# Altium PCB cm4gateway.PcbDoc (part 1 of 5)
Units mil, origin at the board's own origin, x right, y up, seen from the top; angles counter-clockwise.
Board outline 6299.21 x 4960.63 mil, 8 copper layers (Signal 1, Ground Plane 1, Signal 2, Power Plane 1, Power Plane 2, Signal 3, Ground Plane 2, Signal 4), stack 60.024 mil thick; 403 components, 273 nets, 1526 pads, 1156 vias.
Unrouted connection lines stored in the file: 5.
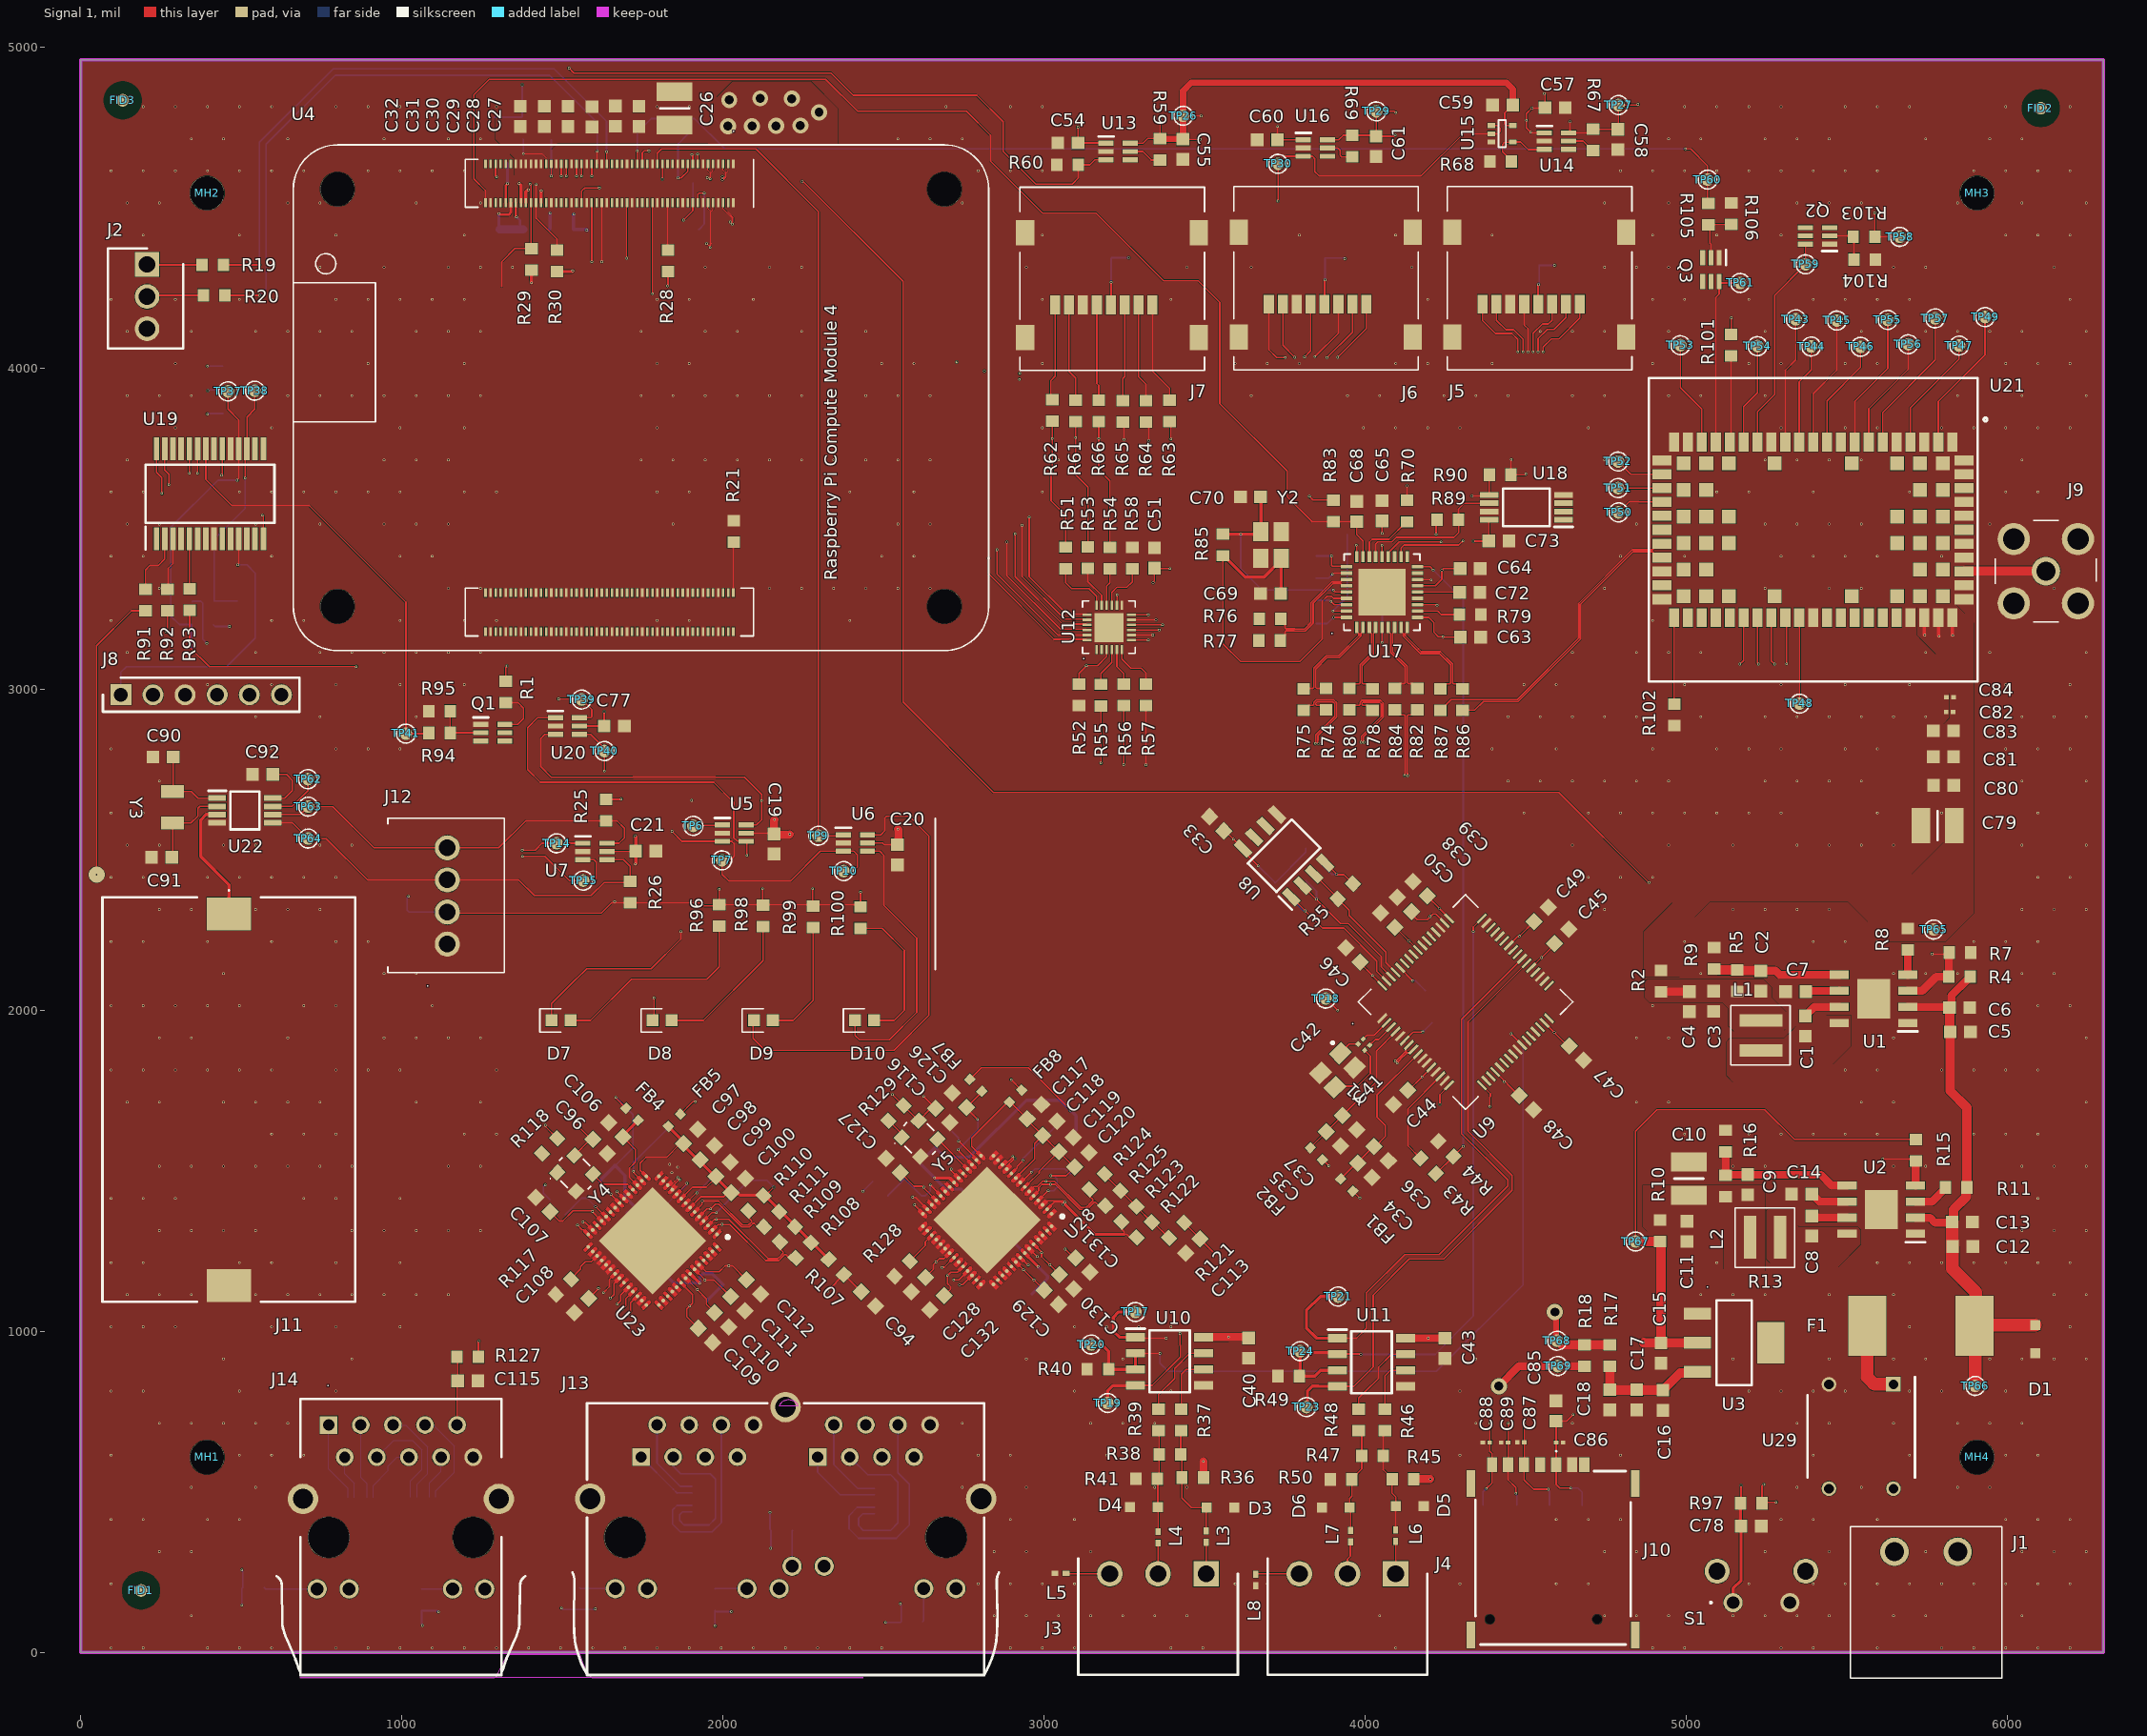
[diagram p0: Signal 1 view]
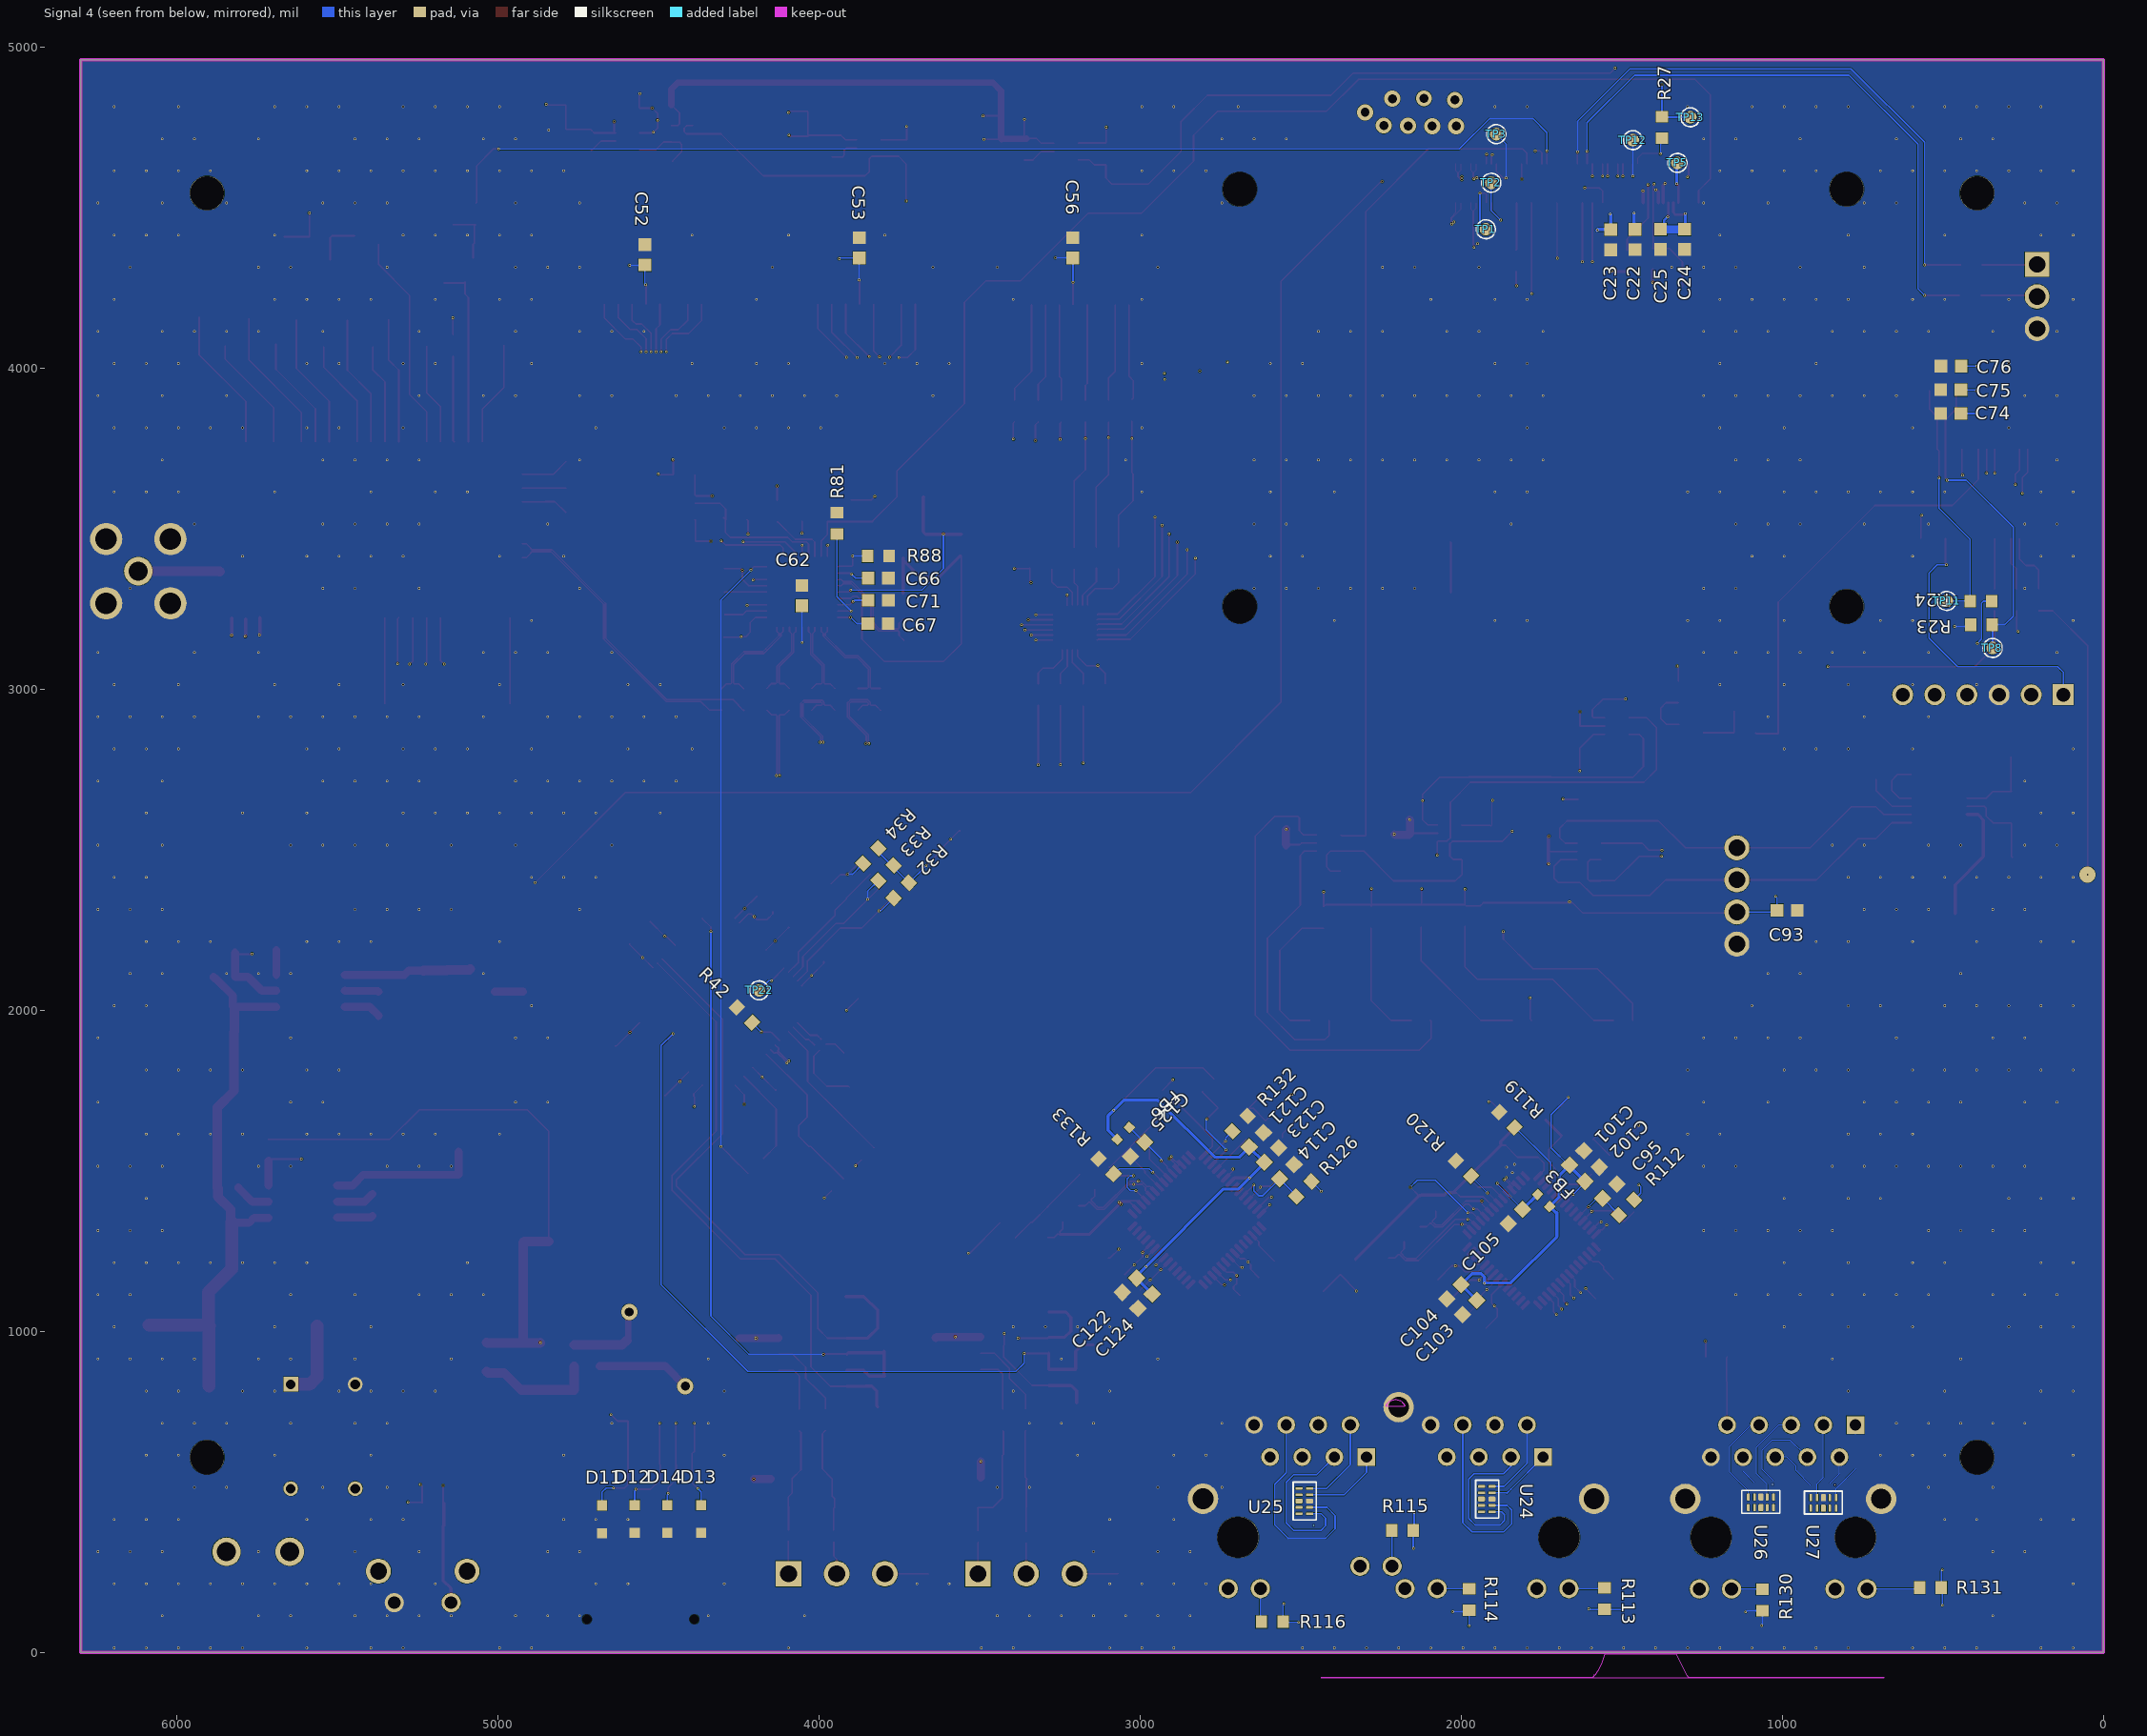
[diagram p1: Signal 4 view, seen from below]
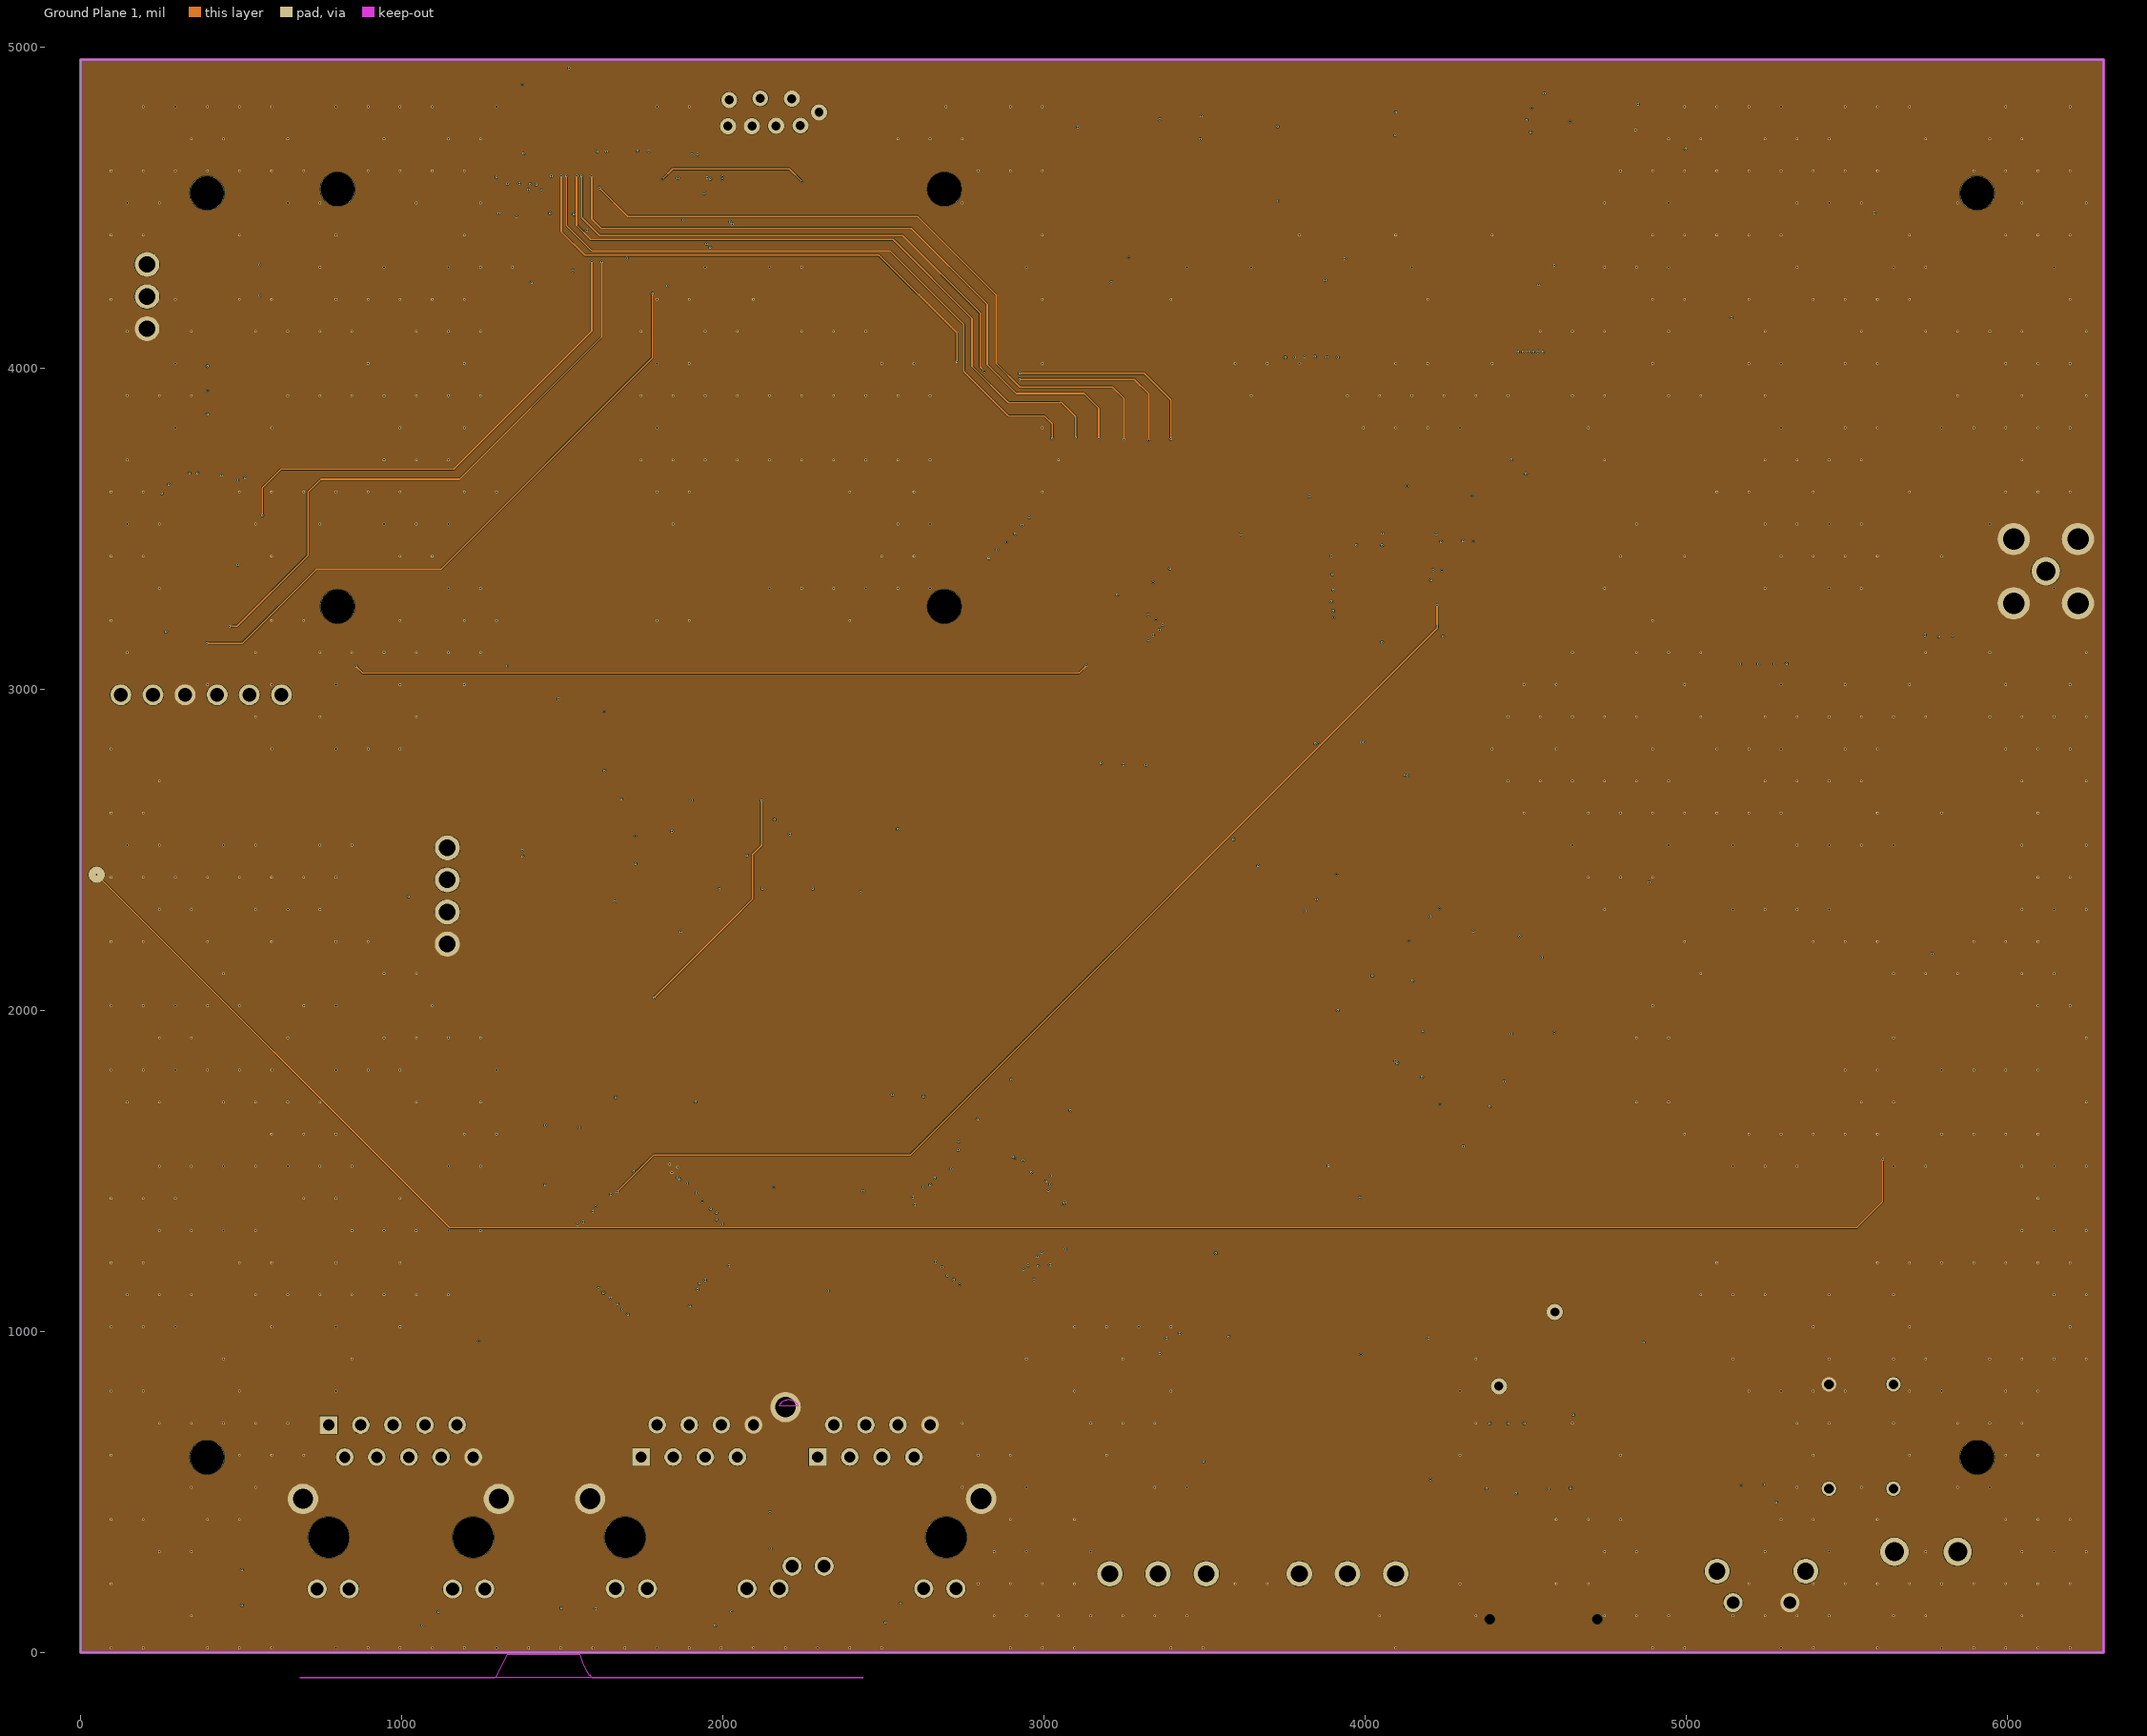
[diagram p2: Ground Plane 1]
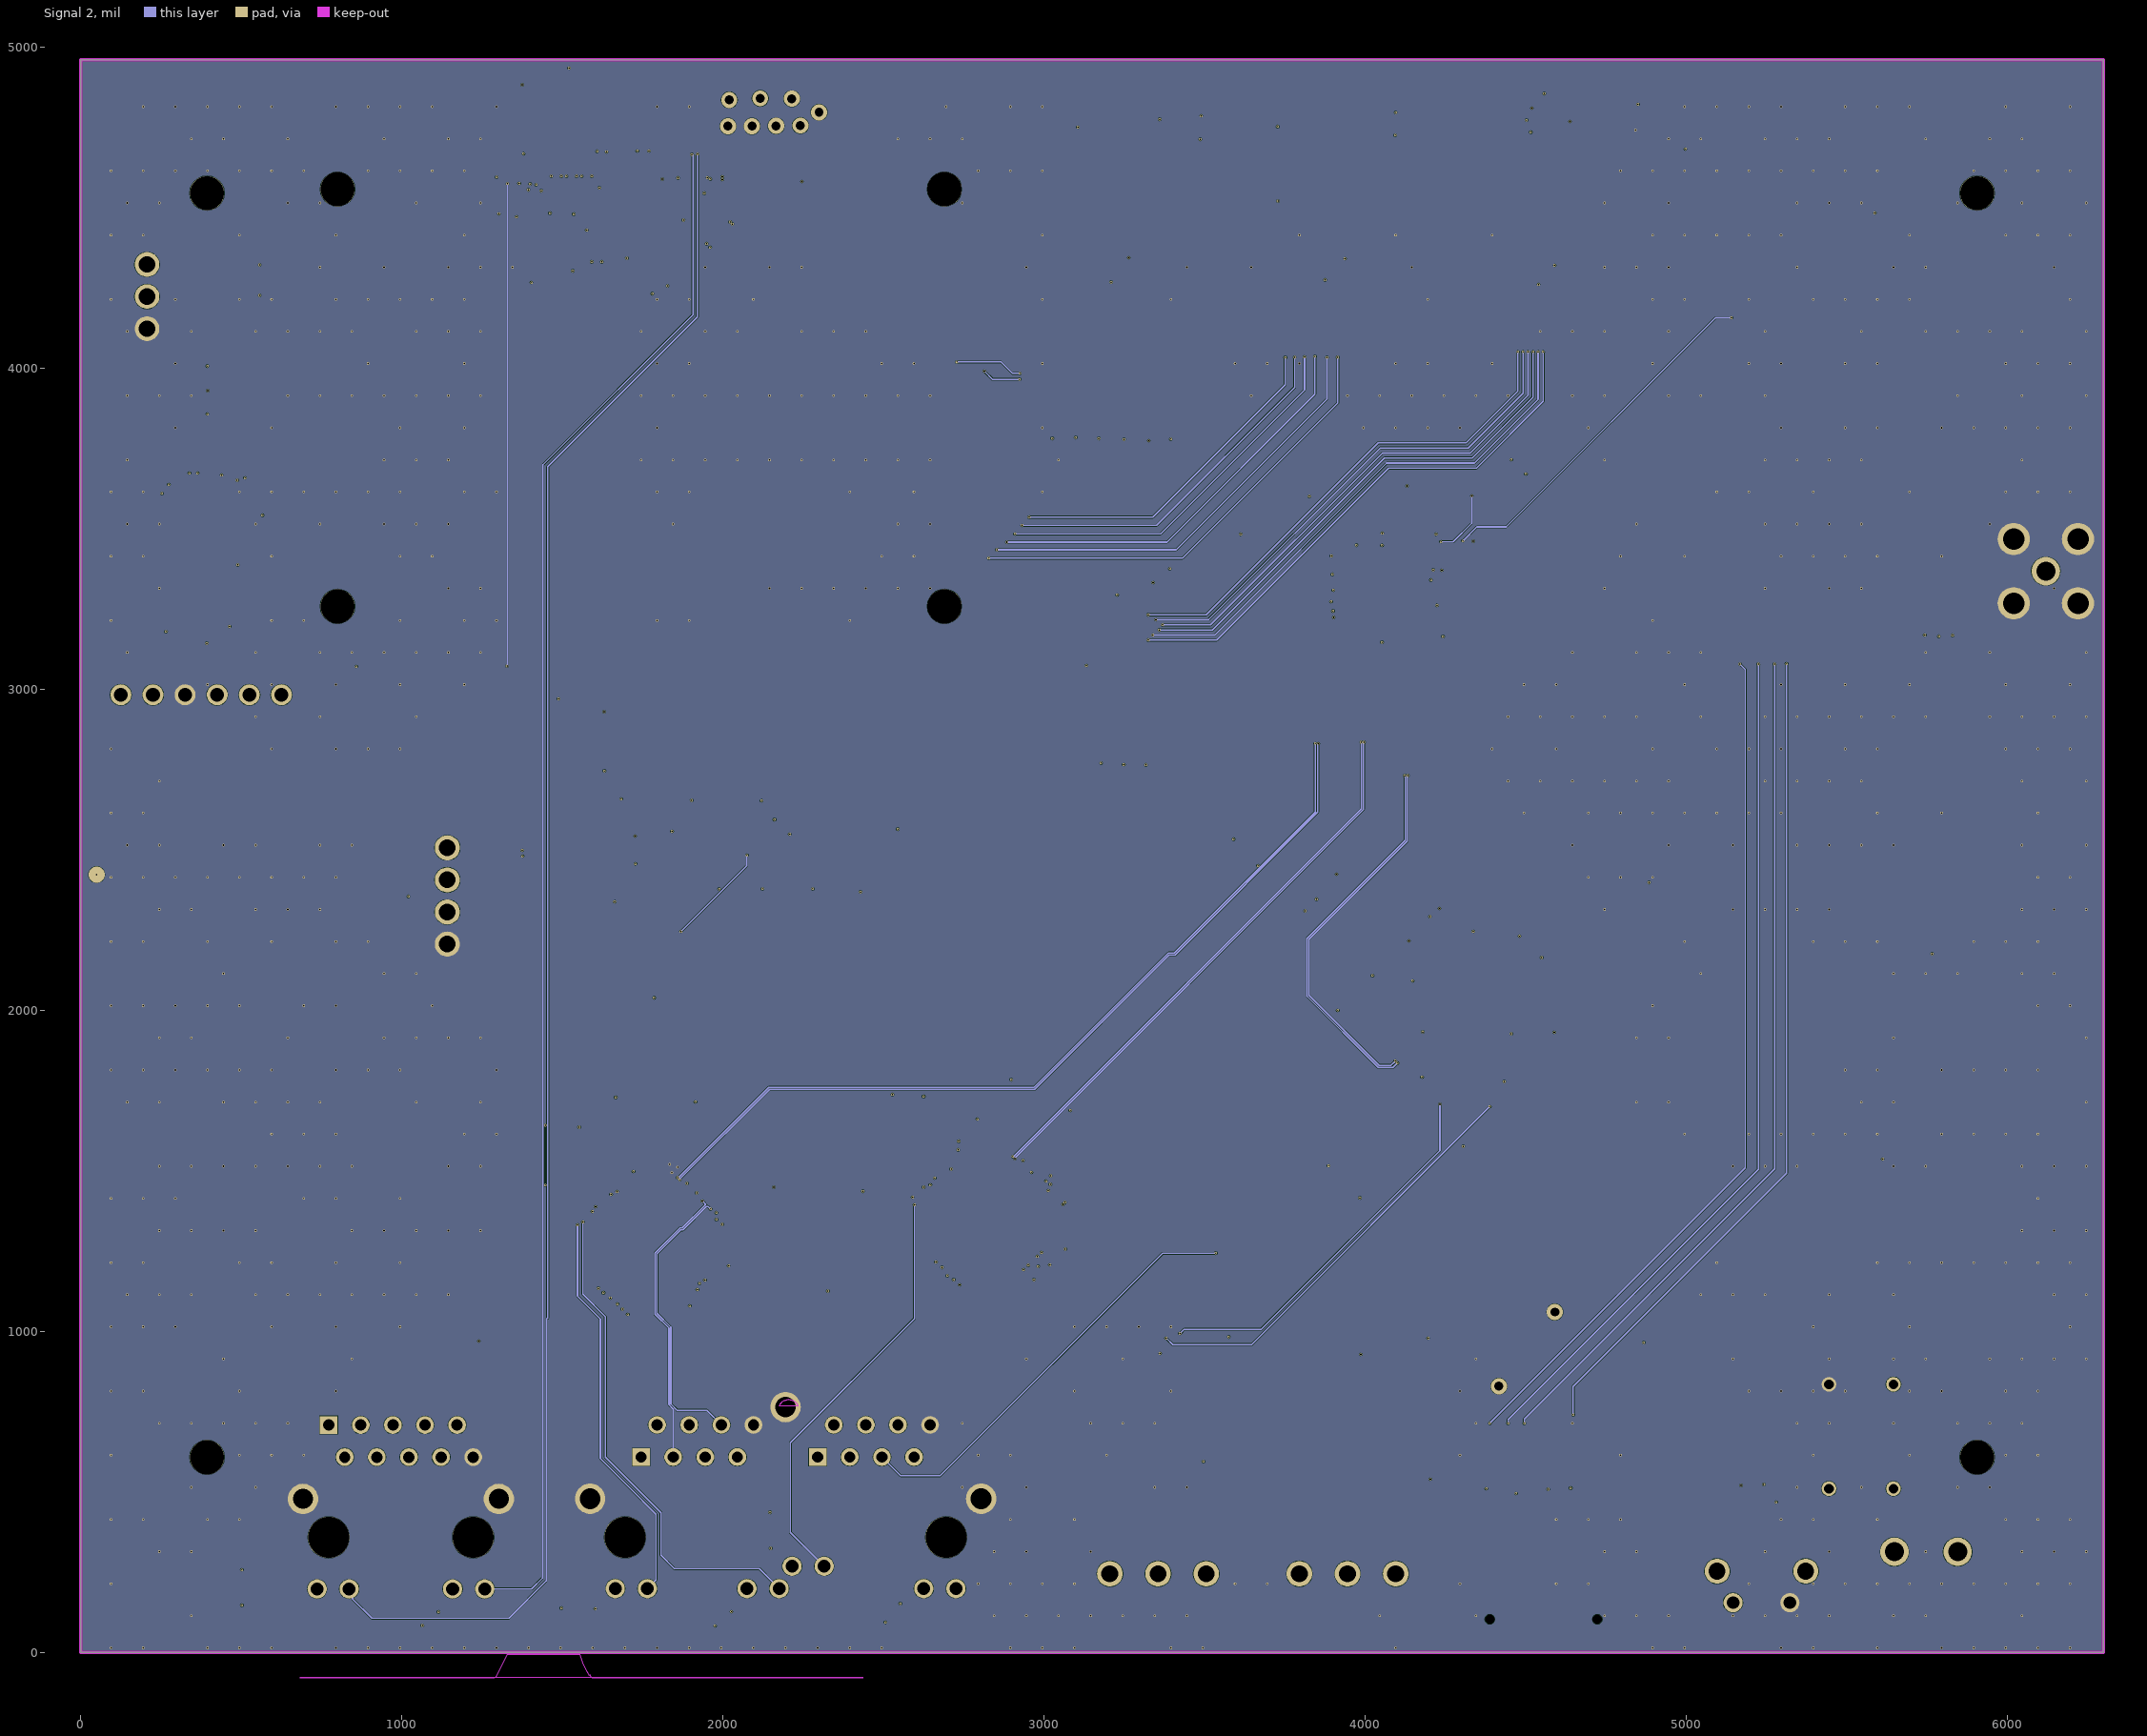
[diagram p3: Signal 2]
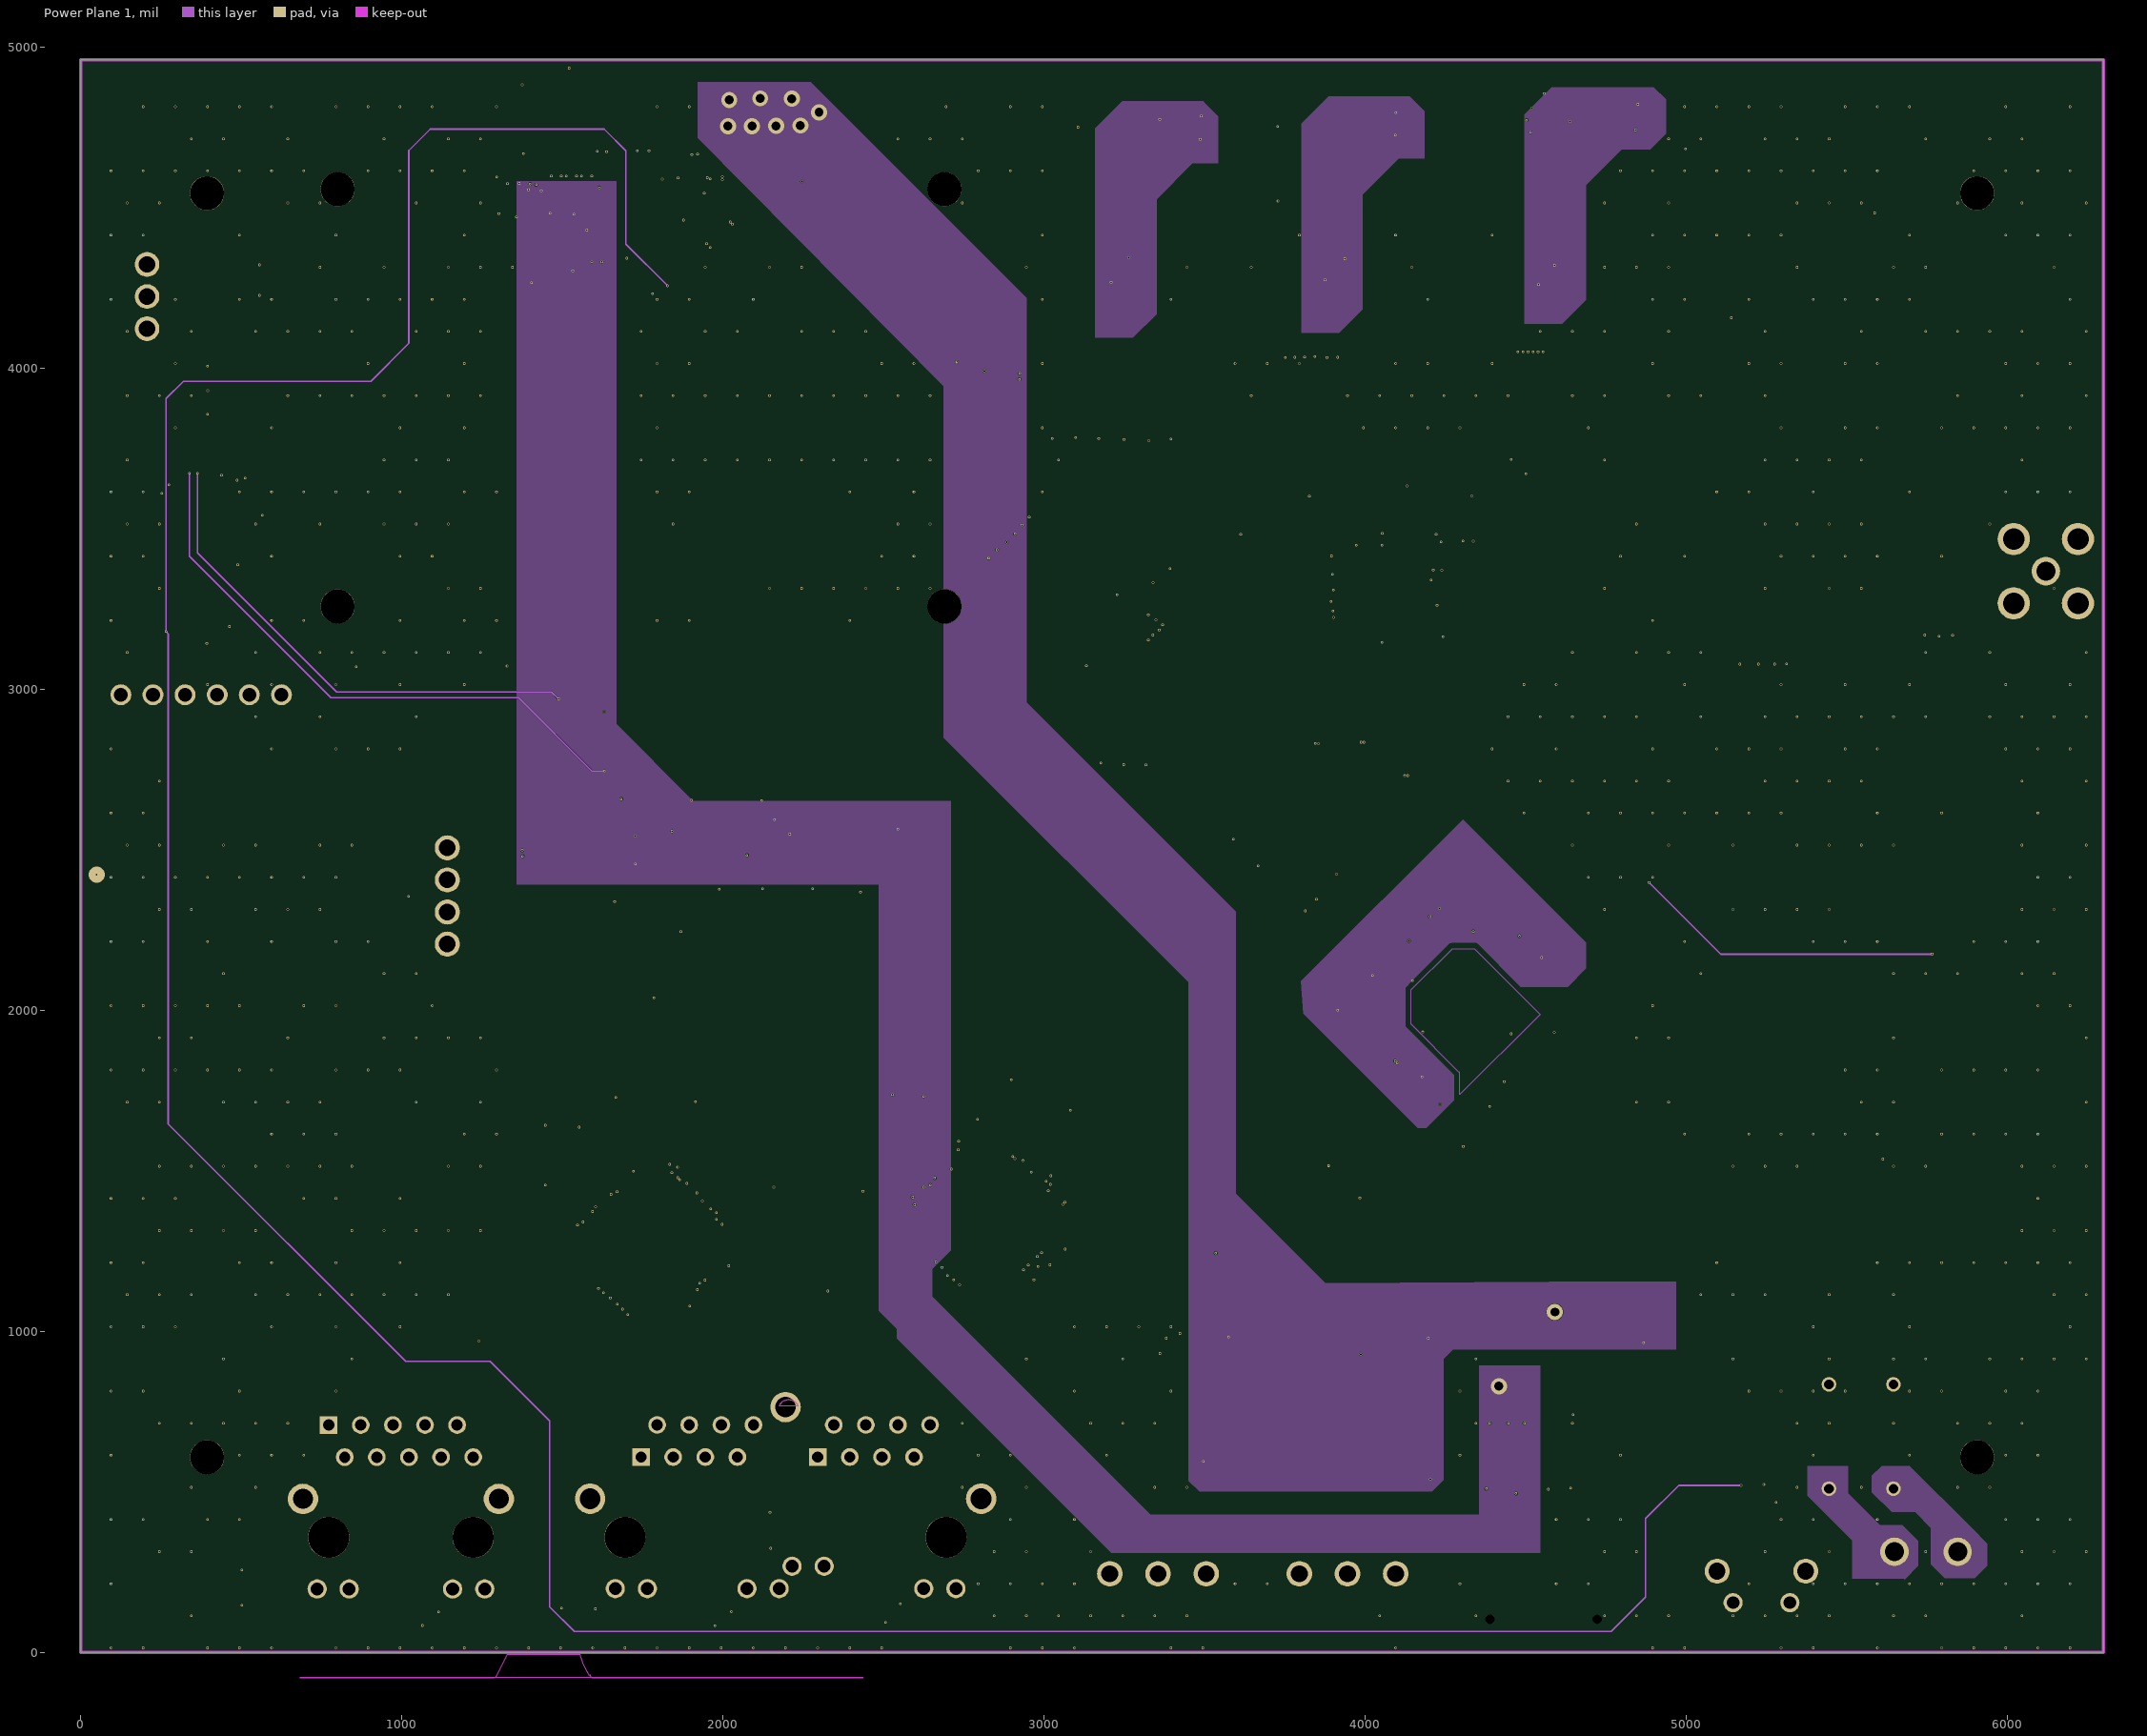
[diagram p4: Power Plane 1]
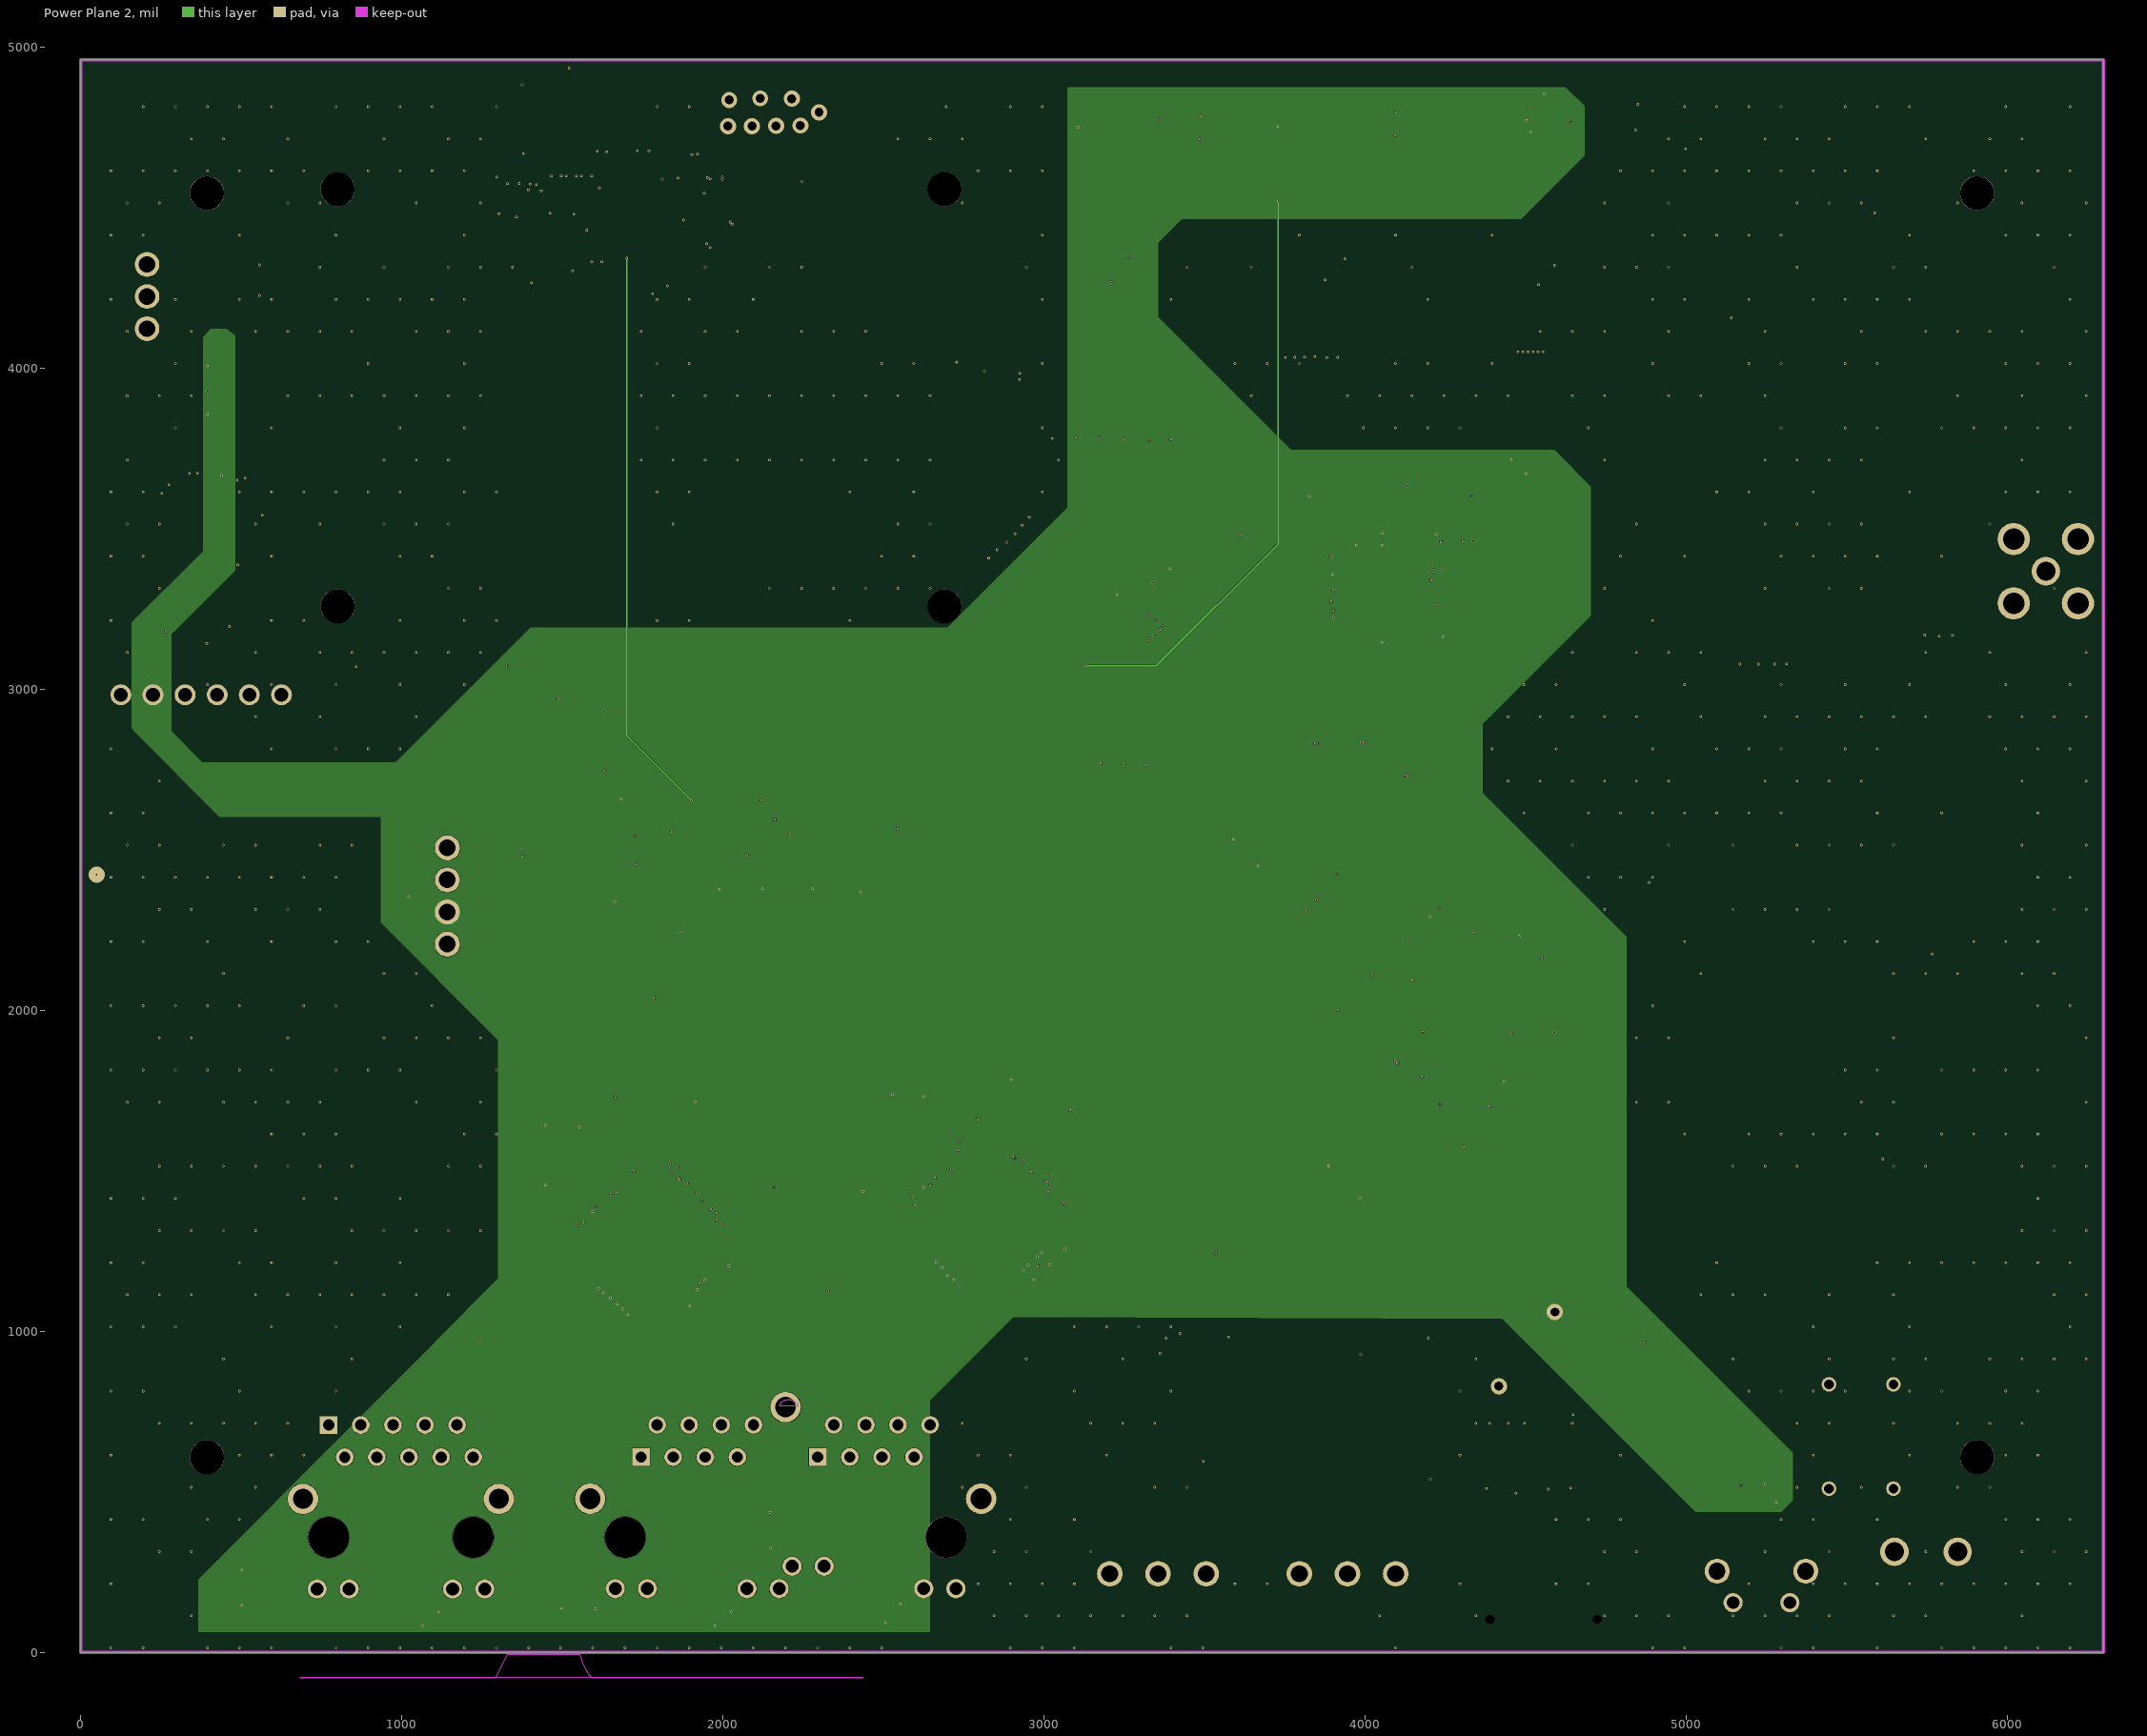
[diagram p5: Power Plane 2]
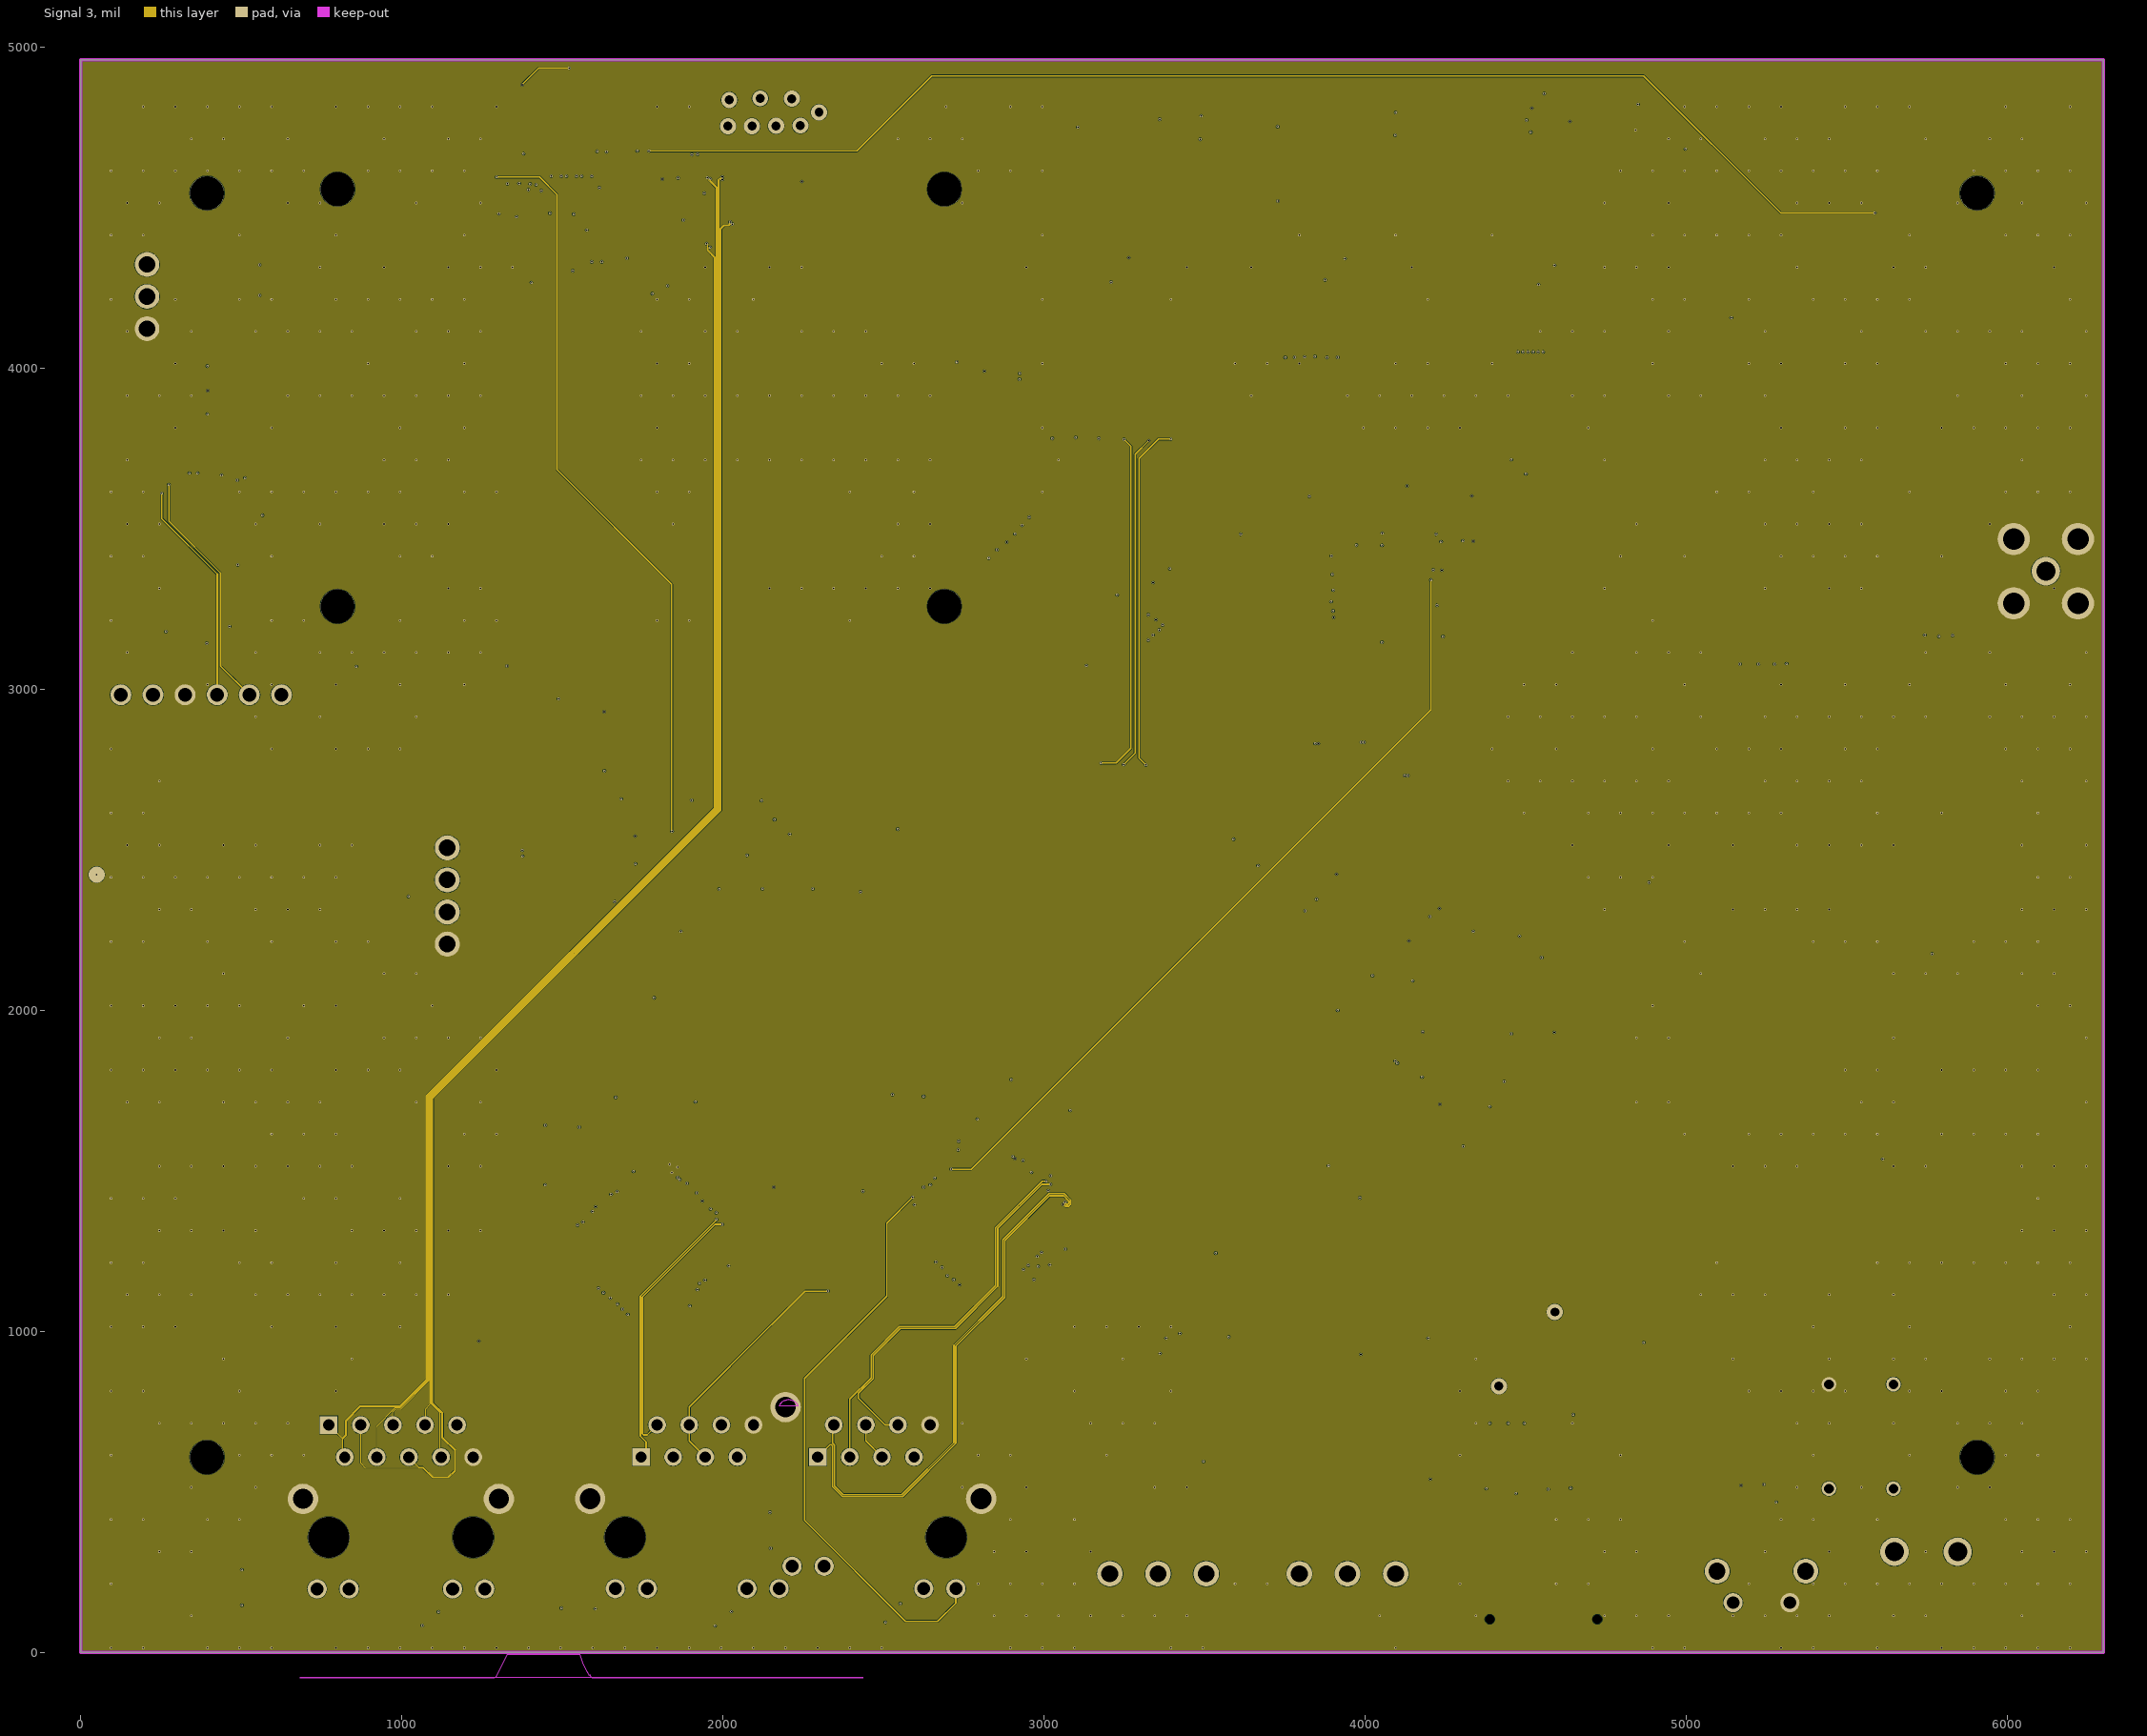
[diagram p6: Signal 3]
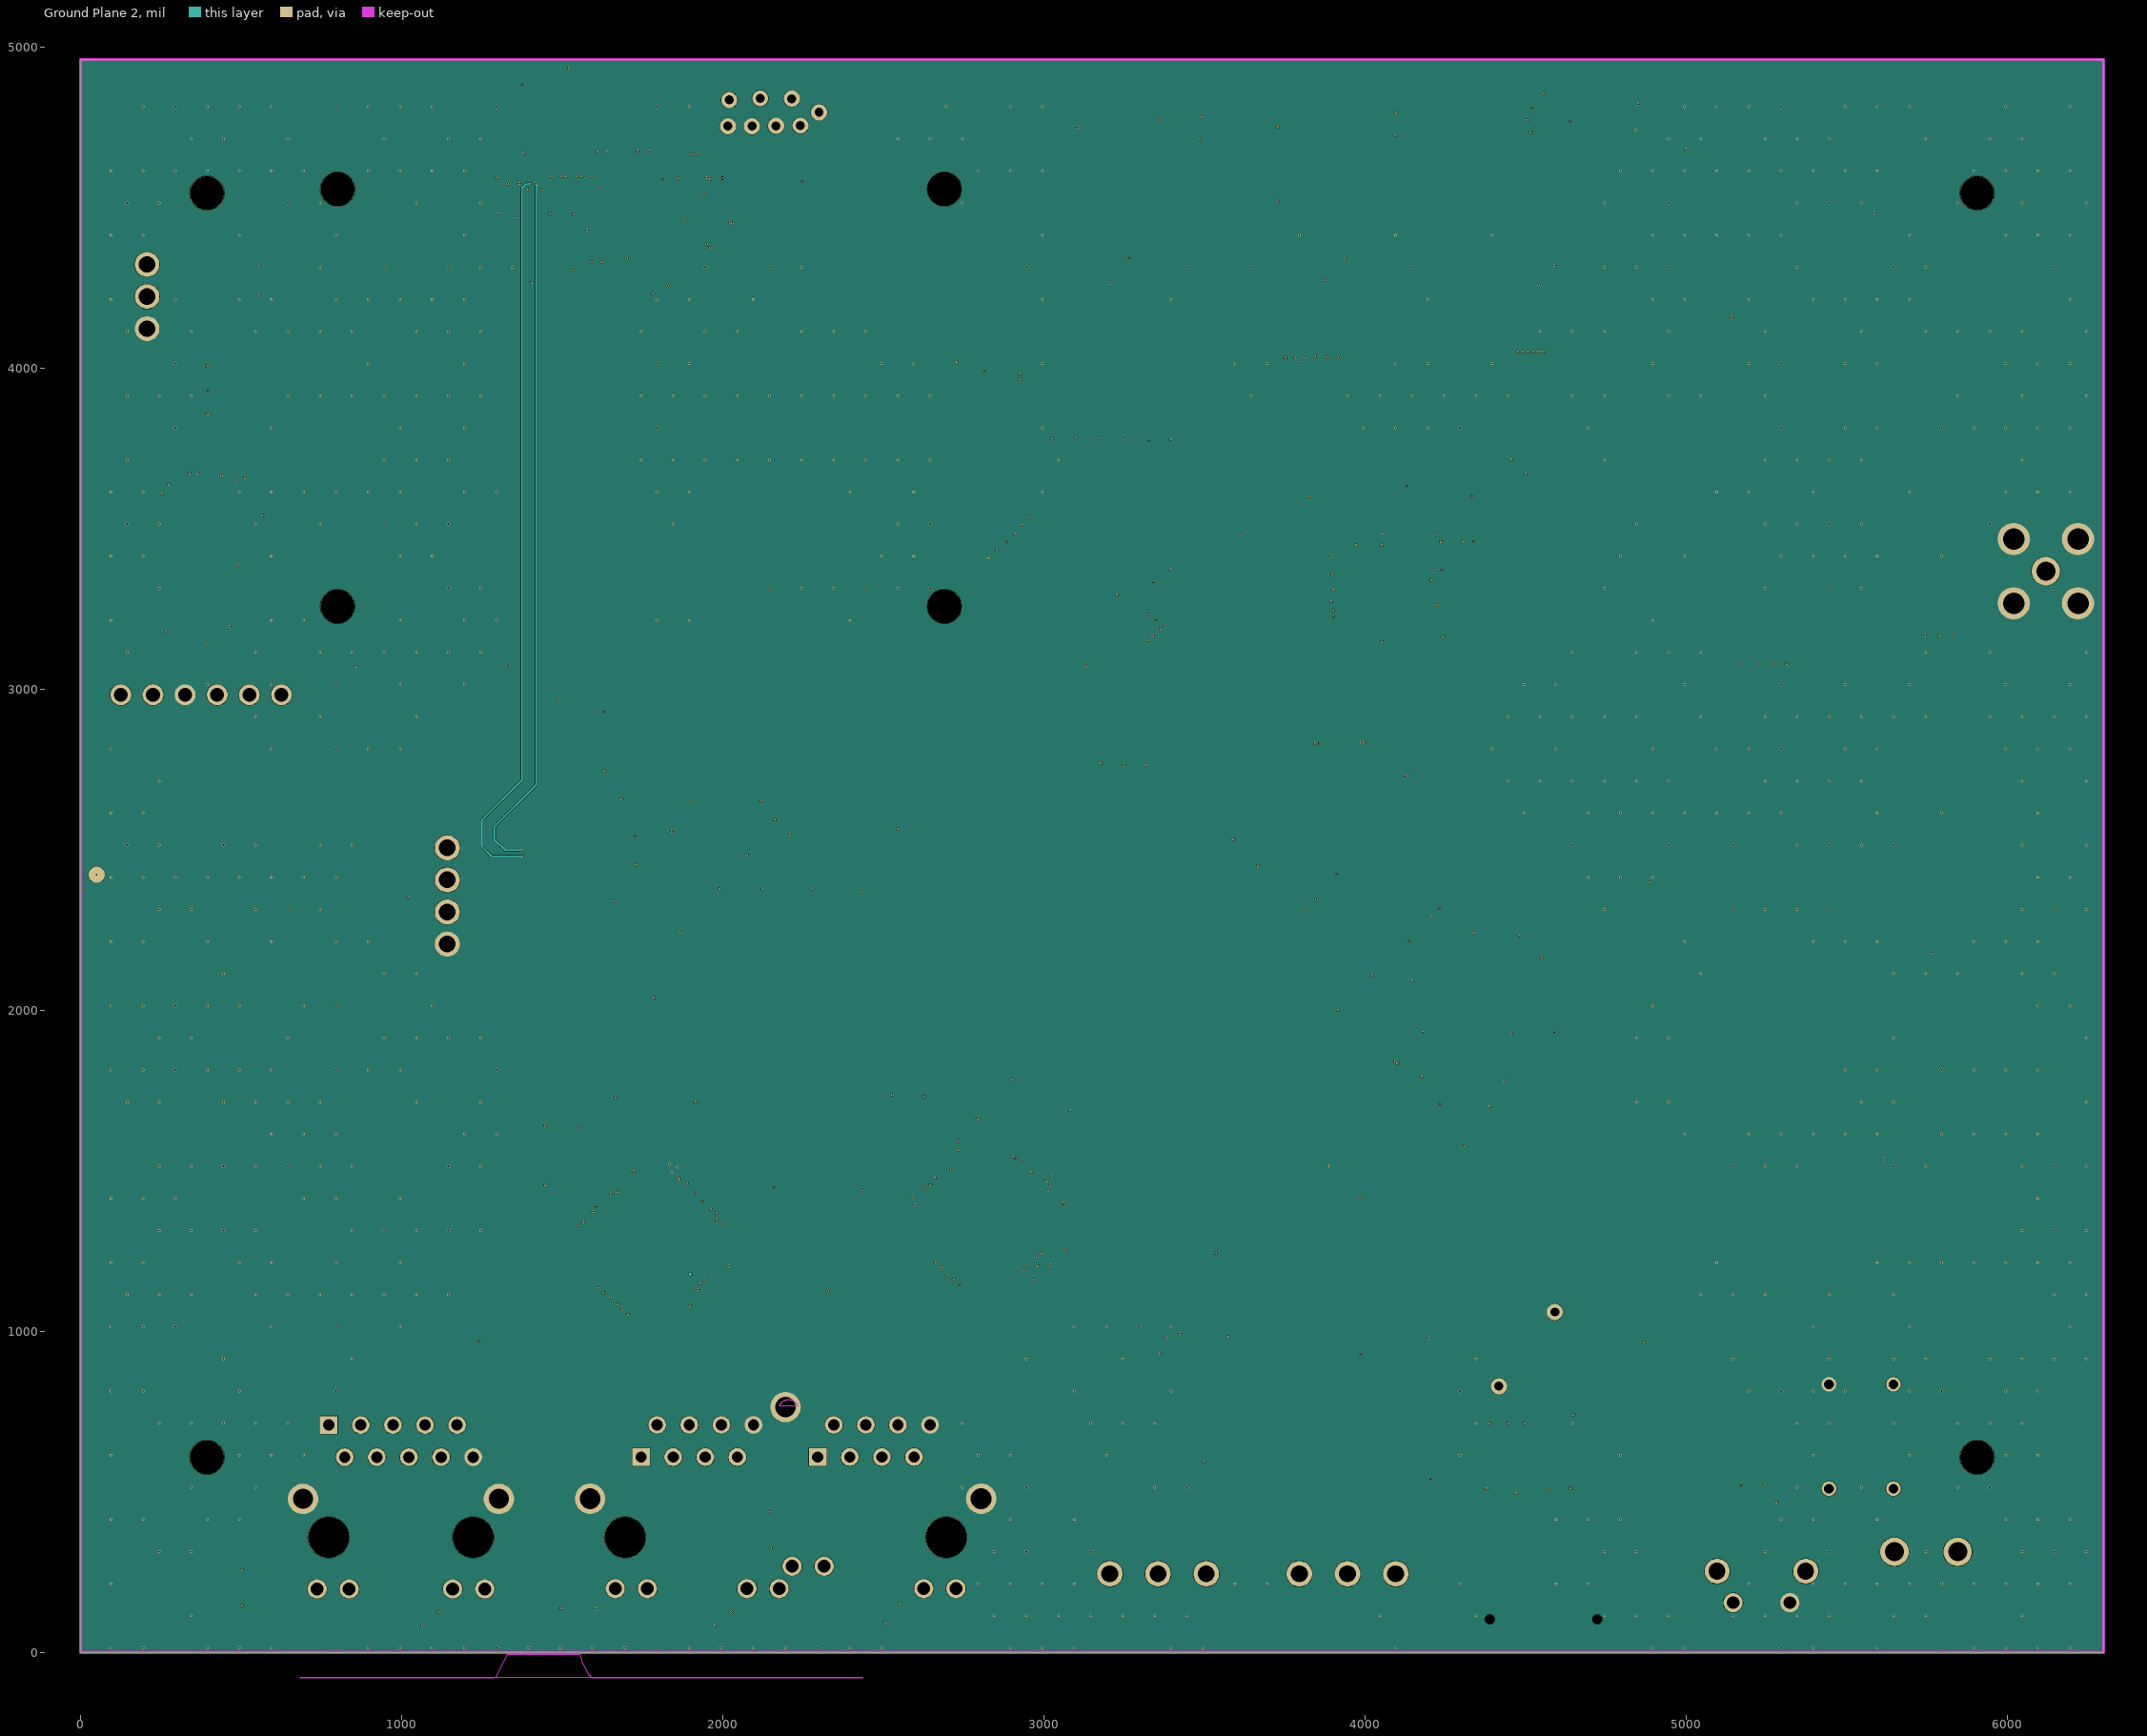
[diagram p7: Ground Plane 2]

## Layer stack, top to bottom
F.Mask: solder mask 0.4, Solder Resist, Dk 3.5
Signal 1: signal copper 1.378
Dielectric 4: prepreg 2.8, PP-006, Dk 4.1
Ground Plane 1: signal copper 1.378
Dielectric 2: prepreg 2.8, PP-006, Dk 4.1
Signal 2: signal copper 1.378
Dielectric 1: dielectric 12.6, FR-4, Dk 4.8
Power Plane 1: signal copper 1.378
Dielectric2: dielectric 12.6, FR-4, Dk 4.8
Power Plane 2: signal copper 1.378
Dielectric3: dielectric 12.6, FR-4, Dk 4.8
Signal 3: signal copper 1.378
Dielectric 3: prepreg 2.8, PP-006, Dk 4.1
Ground Plane 2: signal copper 1.378
Dielectric 5: prepreg 2.8, PP-006, Dk 4.1
Signal 4: signal copper 1.378
B.Mask: solder mask 0.4, Solder Resist, Dk 3.5

## Board outline
-0.17,-0.32 -0.17,4960.31 6299.04,4960.31 6299.04,-0.32
cut-out: 2175.28,767.67 cw(c2204.55,755.2) 2233.83,767.67
cut-out: 683.3,-79.32 900.23,-79.32 683.29,-79.32 1284.87,-79.32 ccw(c1284.87,-67.24) 1295.69,-72.62 1295.7,-72.6 1329.05,-5.33 1553.47,-5.33 ccw(c1781.33,57.96) 1583.2,-71.15 1586.19,-69.52 ccw(c1596.29,-69.21) 1594.27,-79.11 1596.28,-79.32 2161.44,-79.32 2162.67,-79.32 2246.32,-79.32 2385.07,-79.32 2436.44,-79.32 2246.31,-79.32

## Design rules (kind name [scope] priority, off if disabled: settings)
Clearance [All] p1: gap=1 ignorepadtopadclearanceinfootprint=TRUE
DiffPairsRouting [All] p1: maxlimit=10 minlimit=1 mostfreqgap=1 toplayer_minwidth=1 toplayer_maxwidth=15 toplayer_prefwidth=2 midlayer1_minwidth=1 midlayer1_maxwidth=15 midlayer1_prefwidth=2 midlayer2_minwidth=1 midlayer2_maxwidth=15 midlayer2_prefwidth=2 midlayer3_minwidth=1 midlayer3_maxwidth=15 midlayer3_prefwidth=2 midlayer4_minwidth=1 midlayer4_maxwidth=15 midlayer4_prefwidth=2 midlayer5_minwidth=1 midlayer5_maxwidth=15 midlayer5_prefwidth=2 midlayer6_minwidth=1 midlayer6_maxwidth=15 midlayer6_prefwidth=2 bottomlayer_minwidth=1 bottomlayer_maxwidth=15 bottomlayer_prefwidth=2 maxuncoupledlength=500
MinimumSolderMaskSliver [All] p1: minsoldermaskwidth=2
PlaneClearance [(IsPolygon AND IsPolygon)] p1: clearance=3
PlaneConnect [All] p1: planeconnectstyle=Direct reliefexpansion=20 reliefentries=4 reliefconductorwidth=10 reliefairgap=10
PolygonConnect [All] p1: connectstyle=Direct reliefconductorwidth=10 reliefentries=4 polygonreliefangle="90 Angle" airgapwidth=10
RoutingVias [All] p1: holewidth=5 width=8 viastyle="Through Hole" minholewidth=5 minwidth=1 maxholewidth=5 maxwidth=50
SilkToSolderMaskClearance [IsPad] p1: minsilkscreentomaskgap=2 clearancetoexposedcopper=TRUE
SolderMaskExpansion [All] p1: expansion=1 istentingtop=FALSE
SupplyNets "Schematic Supply Nets_12" [InNet('3V8')] p1: voltage=0.000
SupplyNets "Schematic Supply Nets_11" [InNet('3V3_SDA')] p2: voltage=0.000
SupplyNets "Schematic Supply Nets_10" [InNet('VCC')] p3: voltage=0.000
SupplyNets "Schematic Supply Nets_9" [InNet('3V3_SDB')] p4: voltage=0.000
SupplyNets "Schematic Supply Nets_7" [InNet('5V')] p5: voltage=0.000
SupplyNets "Schematic Supply Nets_6" [InNet('RPi_3V3_OUT')] p6: voltage=0.000
SupplyNets "Schematic Supply Nets_5" [InNet('RPi_1V8_OUT')] p7: voltage=0.000
SupplyNets "Schematic Supply Nets_4" [InNet('3V3_SDD')] p8: voltage=0.000
SupplyNets "Schematic Supply Nets_3" [InNet('VCC_SYS')] p9: voltage=0.000
SupplyNets "Schematic Supply Nets_2" [InNet('1V8')] p10: voltage=0.000
SupplyNets "Schematic Supply Nets_1" [InNet('3v3')] p11: voltage=0.000
SupplyNets "Schematic Supply Nets" [InNet('GND')] p12: voltage=0.000
Width [All] p1: maxlimit=50 minlimit=1 preferedwidth=1
25 further rules are at their usual default settings.

## Classes and differential pairs
differential pair class USB_N_RS485_DIFFPAIR: _D3
differential pair class USB_P_LAN1_DIFFPAIR: _D2
differential pair class USB_P_LAN0_DIFFPAIR: _D1
differential pair class USB_CELL_DIFFPAIR: _D4
differential pair class ETH_P3_DIFFPAIR: ETH_P3
differential pair class ETH_P2_DIFFPAIR: ETH_P2
differential pair class ETH_P1_DIFFPAIR: ETH_P1
differential pair class ETH_P0_DIFFPAIR: ETH_P0
differential pair class USB_DIFFPAIR: USB
differential pair class RPi_USB_Diff: RPi_USB
differential pair class D_DIFFPAIR: D
differential pair class D3_DIFFPAIR: D3
differential pair class D2_DIFFPAIR: D2
differential pair class D1_diff: D1
differential pair class _D4_DIFFPAIR: _D4
differential pair class _D3_DIFFPAIR: _D3
differential pair class _D2_DIFFPAIR: _D2
differential pair class _D1_diff: _D1
component class "USB HUB": C62 C63 C64 C65 C66 C67 C68 C69 C70 C71 C72 C73 R70 R74 R75 R76 R77 R78 R79 R80 R81 R82 R83 R84 R85 R86 R87 R88 R89 R90 U17 U18 Y2
component class SD-CARD: C51 C52 C53 C54 C55 C56 C57 C58 C59 C60 C61 J5 J6 J7 R51 R52 R53 R54 R55 R56 R57 R58 R59 R60 R61 R62 R63 R64 R65 R66 R67 R68 R69 TP26 TP27 TP29 TP30 U12 U13 U14 U15 U16
component class RS-485: 45 C33 C34 C35 C36 C37 C38 C39 C40 C41 C42 C43 C44 C45 C46 C47 C48 C49 C50 D3 D4 D5 D6 FB1 FB2 J3 J4 L3 L4 L5 L6 L7 L8 R32 R33 R34 R35 R36 R37 R38 R39 R40 R41 R42 R43 R44 R45 R46 R47 R48 R49 R50 TP17 TP18 TP19 TP20 TP21 TP22 TP23 TP24 U8 U9 U10 U11 Y1
component class RPI: C19 C20 C21 C22 C23 C24 C25 C26 C27 C28 C29 C30 C31 C32 J2 R19 R20 R21 R23 R24 R25 R26 R27 R28 R29 R30 TP1 TP2 TP3 TP5 TP6 TP7 TP8 TP9 TP10 TP12 TP13 TP14 TP15 U4 U5 U6 U7
component class "LAN & Ethernet": C94 C95 C96 C97 C98 C99 C100 C101 C102 C103 C104 C105 C106 C107 C108 C109 C110 C111 C112 C113 C114 C115 C116 C117 C118 C119 C120 C121 C122 C123 C124 C125 C126 C127 C128 C129 C130 C131 C132 FB3 FB4 FB5 FB6 FB7 FB8 J13 J14 R107 R108 R109 R110 R111 R112 R113 R114 R115 R116 R117 R118 R119 R120 R121 R122 R123 R124 R125 R126 R127 R128 R129 R130 R131 R132 R133 U23 U24 U25 U26 U27 U28 Y4 Y5
component class I2C: C90 C91 C92 C93 J11 J12 TP62 TP63 TP64 U22 Y3
component class CELLULAR: C79 C80 C81 C82 C83 C84 C85 C86 C87 C88 C89 D11 D12 D13 D14 J9 J10 Q2 Q3 R101 R102 R103 R104 R105 R106 TP43 TP44 TP45 TP46 TP47 TP48 TP49 TP50 TP51 TP52 TP53 TP54 TP55 TP56 TP57 TP58 TP59 TP60 TP61 U21
component class "POWER SUPPLY": C1 C2 C3 C4 C5 C6 C7 C8 C9 C10 C11 C12 C13 C14 C15 C16 C17 C18 D1 F1 J1 L1 L2 R2 R4 R5 R7 R8 R9 R10 R11 R13 R15 R16 R17 R18 TP65 TP66 TP67 TP68 TP69 U1 U2 U3 U29
component class cm4gateway: FID1 FID2 FID3 MH1 MH2 MH3 MH4 R1
component class CPU_superviser: B? C74 C75 C76 C77 C78 D7 D8 D9 D10 J8 Q1 R91 R92 R93 R94 R95 R96 R97 R98 R99 R100 S1 TP37 TP38 TP39 TP40 TP41 U19 U20
differential pair LAN1_TX: +LAN1_TX_P -LAN1_TX_N
differential pair LAN1_RX: +LAN1_RX_P -LAN1_RX_N
differential pair LAN0_TX: +LAN0_TX_P -LAN0_TX_N
differential pair LAN0_RX: +LAN0_RX_P -LAN0_RX_N
differential pair ETH_P3: +ETH_P3_P -ETH_P3_N
differential pair ETH_P2: +ETH_P2_P -ETH_P2_N
differential pair ETH_P1: +ETH_P1_P -ETH_P1_N
differential pair ETH_P0: +ETH_P0_P -ETH_P0_N
differential pair USB: +USB_P -USB_N
differential pair RPi_USB: +RPi_USB_P -RPi_USB_N
differential pair D: +D_P -D_N
differential pair D4: +D4_P -D4_N
differential pair D3: +D3_P -D3_N
differential pair D2: +D2_P -D2_N
differential pair D1: +D1_P -D1_N
differential pair _D4: +_D4_P -_D4_N
differential pair _D3: +_D3_P -_D3_N
differential pair _D2: +_D2_P -_D2_N
differential pair _D1: +_D1_P -_D1_N

## Components (designator, comment, footprint, x,y, rotation, side; value= is the part's Value field where it differs from the comment)
C1 "Capacitor" CAPC1608N 5370.66,1950.85 r270 top
C2 "Capacitor" CAPC1608N 5231.88,2090.61 r270 top
C3 "Capacitor" CAPC1608N 5085.22,2027.62 r90 top
C4 "Capacitor" CAPC1608N 5009.44,2026.63 r90 top
C5 "Capacitor" CAPC1608N 5852.94,1932.15 r180 top
C6 "Capacitor" CAPC1608N 5850.97,2007.93 r180 top
C7 "Capacitor" CAPC1608N 5340.15,2058.13 r0 top
C8 "Capacitor" CAPC1608N 5390.75,1327.76 r270 top
C9 "Capacitor" CAPC1608N 5190.94,1456.69 r270 top
C10 "T491D476K006AT" CAPC1210 5007.87,1475.39 r270 top
C11 "Capacitor" CAPC1608N 5001.97,1311.02 r90 top
C12 "Capacitor" CAPC1608N 5860.24,1263.78 r180 top
C13 "Capacitor" CAPC1608N 5859.25,1340.55 r180 top
C14 "Capacitor" CAPC1608N 5359.25,1427.17 r0 top
C15 "Capacitor" CAPC1608N 4921.26,932.09 r90 top
C16 "GRM188R61E106MA73D" CAPC1608N 4927.17,785.43 r90 top
C17 "Capacitor" CAPC1608N 4845.47,786.42 r90 top
C18 "C0603C103J5RACTU" CAPC1608N 4761.81,786.42 r90 top
C19 "GRM188R71H104KA93D" CAPC1608N 2159.45,2517.72 r90 top
C20 "GRM188R71H104KA93D" CAPC1608N 2543.66,2484.07 r90 top
C21 "GRM188R71H104KA93D" CAPC1608N 1759.84,2495.08 r180 top
C22 "C0603C105K8PACTU" CAPC1608N 1459.14,4399.77 r90 bottom
C23 "GRM188R71H104KA93D" CAPC1608N 1534.67,4399.61 r90 bottom
C24 "C0603C105K8PACTU" CAPC1608N 1304.36,4400.59 r90 bottom
C25 "GRM188R71H104KA93D" CAPC1608N 1379.16,4400.59 r90 bottom
C26 "T491D337K006AT" CAPC1210 1849.41,4808.07 r270 top
C27 "GRM188R61H106KAALD" CAPC1608N 1738.19,4783.46 r270 top
C28 "GRM188R61H106KAALD" CAPC1608N 1665.35,4784.45 r270 top
C29 "GRM188R61H106KAALD" CAPC1608N 1592.52,4782.48 r270 top
C30 "GRM188R61H106KAALD" CAPC1608N 1517.72,4783.46 r270 top
C31 "GRM188R71H104KA93D" CAPC1608N 1443.9,4783.46 r270 top
C32 "C0603C103J5RACTU" CAPC1608N 1369.09,4783.46 r270 top
C33 "GRM188R71H104KA93D" CAPC1608N 3537.66,2580.72 r315 top
C34 "GRM188R61H475KE11D" CAPC1608N 3998.4,1501.86 r135 top
C35 "GRM188R61H475KE11D" CAPC1608N 3900.96,1599.04 r135 top
C36 "GRM188R71H104KA93D" CAPC1608N 4049.95,1553.66 r135 top
C37 "GRM188R71H104KA93D" CAPC1608N 3951.15,1649.24 r135 top
C38 "GRM188R71H104KA93D" CAPC1608N 4121.43,2329.36 r315 top
C39 "" CAPC1608N 4170.64,2377.99 r315 top
C40 "GRM188R71H104KA93D" CAPC1608N 3636.81,947.83 r90 top
C41 "GRM1555C1H8R2CA01D" CAPC402 3986.01,1902.43 r225 top
C42 "GRM1555C1H8R2CA01D" CAPC402 4006.07,1883.36 r225 top
C43 "GRM188R71H104KA93D" CAPC1608N 4248.03,946.85 r90 top
C44 "GRM188R71H104KA93D" CAPC1608N 4110.6,1728.96 r45 top
C45 "GRM188R71H104KA93D" CAPC1608N 4611.59,2229.95 r225 top
C46 "GRM188R71H104KA93D" CAPC1608N 3962.35,2172.49 r315 top
C47 "GRM188R71H104KA93D" CAPC1608N 4657.85,1866.76 r135 top
C48 "GRM188R71H104KA93D" CAPC1608N 4502.34,1712.23 r135 top
C49 "GRM188R71H104KA93D" CAPC1608N 4547.61,2297.86 r225 top
C50 "GRM188R71H104KA93D" CAPC1608N 4069.63,2279.78 r315 top
C51 "GRM188R71H104KA93D" CAPC1608N 3343.5,3408.46 r90 top
C52 "GRM188R61H106KAALD" CAPC1608N 4542.1,4352.36 r270 bottom
C53 "GRM188R61H106KAALD" CAPC1608N 3874.02,4374.02 r270 bottom
C54 "GRM188R71H104KA93D" CAPC1608N 3073.82,4700.79 r180 top
C55 "GRM188R71H104KA93D" CAPC1608N 3432.09,4681.1 r270 top
C56 "GRM188R61H106KAALD" CAPC1608N 3209.65,4374.02 r270 bottom
C57 "GRM188R71H104KA93D" CAPC1608N 4591.54,4811.02 r0 top
C58 "GRM188R71H104KA93D" CAPC1608N 4786.42,4711.61 r270 top
C59 "GRM188R71H104KA93D" CAPC1608N 4428.15,4818.9 r180 top
C60 "GRM188R71H104KA93D" CAPC1608N 3694.88,4710.63 r180 top
C61 "GRM188R71H104KA93D" CAPC1608N 4033.46,4689.96 r270 top
C62 "GRM188R71H104KA93D" CAPC1608N 4053.15,3291.34 r270 bottom
C63 "GRM188R71H104KA93D" CAPC1608N 4327.76,3161.42 r180 top
C64 "GRM188R71H104KA93D" CAPC1608N 4326.77,3375 r180 top
C65 "GRM188R71H104KA93D" CAPC1608N 4052.17,3555.12 r270 top
C66 "GRM188R71H104KA93D" CAPC1608N 3814.96,3345.47 r0 bottom
C67 "GRM188R71H104KA93D" CAPC1608N 3815.94,3203.74 r0 bottom
C68 "GRM188R71H104KA93D" CAPC1608N 3973.43,3553.15 r270 top
C69 "GRM1885C1H180JA01D" CAPC1608N 3705.7,3297.25 r0 top
C70 "GRM1885C1H180JA01D" CAPC1608N 3642.71,3598.43 r0 top
C71 "GRM188R71H104KA93D" CAPC1608N 3814.96,3276.57 r0 bottom
C72 "GRM188R71H104KA93D" CAPC1608N 4325.79,3301.18 r180 top
C73 "GRM188R71H104KA93D" CAPC1608N 4416.34,3461.61 r180 top
C74 "Capacitor" CAPC1608N 475.39,3858.27 r180 bottom
C75 "Capacitor" CAPC1608N 475.39,3932.09 r180 bottom
C76 "Capacitor" CAPC1608N 474.41,4005.91 r180 bottom
C77 "Capacitor" CAPC1608N 1661.41,2884.83 r180 top
C78 "Capacitor" CAPC1608N 5201.77,392.72 r180 top
C79 "T491D476K006AT" CAPC1210 5782.48,2574.8 r0 top
C80 "GRM188R71H104KA93D" CAPC1608N 5801.18,2699.8 r180 top
C81 "GRM188R71H103KA01D" CAPC1608N 5800.2,2789.37 r0 top
C82 "KGM05ACG1H560KH" CAPC402 5819.8,2929.06 r0 top
C83 "GRM1885C1H150JA01D" CAPC1608N 5800.2,2870.08 r0 top
C84 "GRM1555C1H8R2CA01D" CAPC402 5820.59,2974.49 r0 top
C85 "GRM188R71H104KA93D" CAPC1608N 4593.5,751.97 r90 top
C86 "C0402C470J5GAC" CAPC402 4605.31,653.54 r180 top
C87 "C0402C470J5GAC" CAPC402 4484.45,654.53 r0 top
C88 "C0402C470J5GAC" CAPC402 4376.77,653.54 r0 top
C89 "C0402C470J5GAC" CAPC402 4434.06,653.54 r0 top
C90 "" CAPC1608N 256.89,2788.39 r0 top
C91 "" CAPC1608N 251.97,2476.38 r0 top
C92 "GRM188R71H104KA93D" CAPC1608N 566.93,2734.25 r0 top
C93 "Capacitor" CAPC1608N 985.24,2311.02 r0 bottom
C94 "GRM188R71H223KA01D" CAPC1608N 2453.12,1101.01 r135 top
C95 "GRM188R71H104KA93D" CAPC1608N 1537.77,1436.64 r315 bottom
C96 "GRM188R71H104KA93D" CAPC1608N 1617.49,1575.42 r135 top
C97 "GRM188R71H104KA93D" CAPC1608N 1899.61,1606.55 r225 top
C98 "GRM188R71H104KA93D" CAPC1608N 1951.77,1556.35 r225 top
C99 "GRM188R71H472KA01D" CAPC1608N 2000,1504.19 r225 top
C100 "GRM188R71H152KA01D" CAPC1608N 2047.61,1453.37 r225 top
C101 "GRM188R61H105KAALD" CAPC1608N 1640.5,1539.62 r315 bottom
C102 "GRM188R71H104KA93D" CAPC1608N 1592.89,1488.81 r315 bottom
C103 "GRM188R71H472KA01D" CAPC1608N 1973.79,1073.67 r135 bottom
C104 "GRM188R71H152KA01D" CAPC1608N 2023,1122.66 r135 bottom
C105 "GRM188R71H472KA01D" CAPC1608N 1831.69,1357.28 r135 bottom
C106 "GRM188R71H472KA01D" CAPC1608N 1666.09,1627.22 r315 top
C107 "GRM188R71H104KA93D" CAPC1608N 1439.71,1393.95 r315 top
C108 "GRM188R71H104KA93D" CAPC1608N 1559.42,1079.36 r45 top
C109 "GRM188R71H104KA93D" CAPC1608N 1945.87,987.2 r135 top
C110 "GRM188R71H472KA01D" CAPC1608N 1996.43,1036.05 r135 top
C111 "GRM188R71H472KA01D" CAPC1608N 2046.01,1085.88 r135 top
C112 "GRM188R71H152KA01D" CAPC1608N 2095.47,1137.8 r135 top
C113 "GRM188R71H223KA01D" CAPC1608N 3463.58,1265.75 r45 top
C114 "GRM188R71H104KA93D" CAPC1608N 2542.69,1496.68 r315 bottom
C115 "Capacitor" CAPC1608N 1205.71,845.47 r180 top
C116 "GRM188R71H104KA93D" CAPC1608N 2684.67,1671.63 r135 top
C117 "GRM188R71H104KA93D" CAPC1608N 2969.85,1683.44 r225 top
C118 "GRM188R71H104KA93D" CAPC1608N 3017.72,1631.89 r225 top
C119 "GRM188R71H472KA01D" CAPC1608N 3067.91,1581.69 r225 top
C120 "GRM188R71H152KA01D" CAPC1608N 3118.11,1533.46 r225 top
C121 "GRM188R61H105KAALD" CAPC1608N 2637.61,1596.46 r315 bottom
C122 "GRM188R71H104KA93D" CAPC1608N 3033.1,1143.08 r135 bottom
C123 "GRM188R71H472KA01D" CAPC1608N 2590.55,1548.23 r315 bottom
C124 "GRM188R71H152KA01D" CAPC1608N 2984.69,1093.25 r135 bottom
C125 "GRM188R71H472KA01D" CAPC1608N 3007.87,1566.17 r135 bottom
C126 "GRM188R71H472KA01D" CAPC1608N 2736.22,1719.49 r315 top
C127 "GRM188R71H104KA93D" CAPC1608N 2530.51,1515.75 r315 top
C128 "GRM188R71H104KA93D" CAPC1608N 2608.27,1145.67 r45 top
C129 "GRM188R71H104KA93D" CAPC1608N 3023,1105.93 r135 top
C130 "GRM188R71H472KA01D" CAPC1608N 3069.88,1154.53 r135 top
C131 "GRM188R71H472KA01D" CAPC1608N 3121.06,1205.71 r135 top
C132 "GRM188R71H152KA01D" CAPC1608N 2666.71,1088.95 r45 top
D1 "CDSOD323-T12LC" CDSOD323T12LC 6086.61,975.39 r270 top
D3 "CDSOD323-T12LC" CDSOD323T12LC 3549.22,450.79 r0 top
D4 "CDSOD323-T12LC" CDSOD323T12LC 3311.02,452.76 r180 top
D5 "CDSOD323-T12LC" CDSOD323T12LC 4138.78,455.71 r0 top
D6 "CDSOD323-T12LC" CDSOD323T12LC 3908.46,450.79 r180 top
D7 "150060BS75000" LED0603 1495.89,1968.19 r0 top locked
D8 "150060RS75000" LED0603 1810.85,1968.19 r0 top locked
D9 "150060GS75000" LED0603 2125.81,1968.19 r0 top locked
D10 "150060GS75000" LED0603 2440.77,1968.19 r0 top locked
D11 "CDSOD323-T12LC" CDSOD323T12LC 4675.2,414.37 r270 bottom
D12 "CDSOD323-T12LC" CDSOD323T12LC 4573.82,415.35 r270 bottom
D13 "CDSOD323-T12LC" CDSOD323T12LC 4367.13,415.35 r270 bottom
D14 "CDSOD323-T12LC" CDSOD323T12LC 4472.44,415.35 r270 bottom
F1 "3404.2421.22" 3404242122 5730.32,1016.73 r0 top
FB1 "BLM18PG121SN1D" BLM18SP221SN1B 3942.38,1455.51 r135 top
FB2 "BLM18PG121SN1D" BLM18SP221SN1B 3847.81,1552.83 r135 top
FB3 "BLM18PG121SN1D" BLM18SP221SN1B 1743.39,1407.03 r45 bottom
FB4 "BLM18PG121SN1D" BLM18SP221SN1B 1716.9,1675.81 r315 top
FB5 "BLM18PG121SN1D" BLM18SP221SN1B 1848.79,1657.11 r225 top
FB6 "BLM18PG121SN1D" BLM18SP221SN1B 3052.17,1616.14 r135 bottom
FB7 "BLM18PG121SN1D" BLM18SP221SN1B 2787.31,1765.84 r315 top
FB8 "BLM18PG121SN1D" BLM18SP221SN1B 2911.42,1732.28 r225 top
FID1 "Fiducial" FIDUCIAL-1MM 187.99,192.91 r90 top locked
FID2 "Fiducial" FIDUCIAL-1MM 6103.35,4809.06 r90 top locked
FID3 "Fiducial" FIDUCIAL-1MM 130.91,4833.66 r90 top locked
J1 "796644-2" 7966442 5647.86,313.21 r0 top locked
J2 "61900311121" 61900311121 206.69,4322.44 r90 top
J3 "691322310003" 691322310003 3504.83,244.65 r180 top locked
J4 "691322310003" 691322310003 4094.83,244.65 r180 top locked
J5 "47219-2001" MOLEX-SD-47219 4542.13,4259.84 r0 top
J6 "47219-2001" MOLEX-SD-47219 3876.97,4259.84 r0 top
J7 "47219-2001" MOLEX-SD-47219 3211.42,4257.87 r0 top
J8 "61300611121" HDRV6W64P0X254 125.2,2982.28 r0 top
J9 "132203-12" 13220312 6019.32,3267.2 r0 top locked
J10 "2336582-1" 23365821 4584.83,309.68 r0 top locked
J11 "SMTU2032-G.TR" SMTU2032GTR 461.61,1721.46 r270 top
J12 "OLED128x32" OLED128x32 1141.73,2205.71 r90 top locked
J13 "7499021125" WE-RJ45-7499021125 2195.04,352.47 r0 top locked
J14 "7499111121A" WE-RJ45-7499111121A 997.3,452.66 r0 top locked
L1 "XGL4030-472MEC" 1.5uH-XAL4020 5232.86,1921.32 r90 top
L2 "NRS4018T6R8MDGJ" 1.5uH-XAL4020 5245.08,1293.31 r180 top
L3 "MAF0603FAL330BT000" BEADC0603X33N 3504.92,360.24 r270 top
L4 "MAF0603FAL330BT000" BEADC0603X33N 3355.31,358.27 r270 top
L5 "MAF0603FAL330BT000" BEADC0603X33N 3051.18,246.06 r0 top
L6 "MAF0603FAL330BT000" BEADC0603X33N 4094.49,363.19 r270 top
L7 "MAF0603FAL330BT000" BEADC0603X33N 3954.72,362.2 r270 top
L8 "MAF0603FAL330BT000" BEADC0603X33N 3659.45,225.39 r90 top
MH1 "MH" MH-2 393.53,607.56 r0 top locked
MH2 "MH" MH-2 393.53,4544.57 r0 top locked
MH3 "MH" MH-2 5905.34,4544.57 r0 top locked
MH4 "MH" MH-2 5905.34,607.56 r0 top locked
Q1 "NX3008NBKS_115" SOT65P210X110-6N 1283.46,2864.17 r0 top
Q2 "NX3008NBKS_115" SOT65P210X110-6N 5408.46,4411.42 r180 top
Q3 "NX3008NBKS_115" SOT65P210X110-6N 5076.51,4306.1 r270 top
R1 "Resistor" RESC1608N 1323.82,2991.14 r90 top
R2 "Resistor" RESC1608N 4921.26,2090.55 r90 top
R4 "Resistor" RESC1608N 5850.97,2104.39 r0 top
R5 "Resistor" RESC1608N 5158.06,2091.59 r90 top
R7 "Resistor" RESC1608N 5851.96,2179.19 r180 top
R8 "Resistor" RESC1608N 5689.56,2220.53 r270 top
R9 "Resistor" RESC1608N 5086.21,2161.48 r270 top
R10 "Resistor" RESC1608N 4918.31,1312.99 r270 top
R11 "Resistor" RESC1608N 5840.55,1447.83 r0 top
R13 "Resistor" RESC1608N 5122.05,1452.76 r90 top
R15 "Resistor" RESC1608N 5714.57,1563.98 r270 top
R16 "RN731JTTD2492F25" RESC1608N 5122.05,1592.52 r270 top
R17 "Resistor" RESC1608N 4761.81,924.21 r90 top
R18 "Resistor" RESC1608N 4683.07,924.21 r270 top
R19 "RN731JTTD1001F25" RESC1608N 411.42,4320.87 r0 top
R20 "RN731JTTD1001F25" RESC1608N 415.35,4226.38 r0 top
R21 "RN731JTTD2201F25" RESC1608N 2033.46,3491.14 r270 top
R23 "RN731JTTD1001F25" RESC1608N 379.92,3199.8 r0 bottom
R24 "RN731JTTD1001F25" RESC1608N 381.89,3273.62 r180 bottom
R25 "" RESC1608N 1635.83,2623.03 r90 top
R26 "" RESC1608N 1710.63,2368.11 r270 top
R27 "RN731JTTD1001F25" RESC1608N 1375,4749.02 r270 bottom
R28 "RN731JTTD1001F25" RESC1608N 1828.74,4333.66 r90 top
R29 "" RESC1608N 1403.54,4338.58 r90 top
R30 "" RESC1608N 1483.27,4333.66 r90 top
R32 "RN731JTTD1002F25" RESC1608N 3743.37,2373.04 r135 bottom
R33 "RN731JTTD1002F25" RESC1608N 3791.56,2427.21 r135 bottom
R34 "RN731JTTD1002F25" RESC1608N 3838.84,2480.32 r135 bottom
R35 "RN731JTTD2201F25" RESC1608N 3938.25,2370.09 r45 top
R36 "" RESC1608N 3462.6,544.29 r0 top
R37 "" RESC1608N 3427.17,723.43 r270 top
R38 "" RESC1608N 3391.73,616.14 r0 top
R39 "" RESC1608N 3356.3,724.41 r270 top
R40 "RN731JTTD1002F25" RESC1608N 3167.32,881.89 r0 top
R41 "" RESC1608N 3318.9,540.35 r0 top
R42 "ERJ-3EKF1202V" RESC1608N 4231.3,1985.24 r225 bottom
R43 "RN731JTTD1001F25" RESC1608N 4196.23,1514.4 r135 top
R44 "RN731JTTD1002F25" RESC1608N 4251.35,1568.53 r315 top
R45 "" RESC1608N 4117.13,539.37 r0 top
R46 "" RESC1608N 4061.02,723.43 r270 top
R47 "" RESC1608N 4022.64,612.2 r0 top
R48 "" RESC1608N 3979.33,724.41 r270 top
R49 "RN731JTTD1002F25" RESC1608N 3761.81,860.24 r0 top
R50 "" RESC1608N 3925.2,538.39 r0 top
R51 "ERJ-3EKF22R0V" RESC1608N 3066.93,3408.46 r270 top
R52 "RN731JTTD1002F25" RESC1608N 3108.27,2982.28 r90 top
R53 "ERJ-3EKF22R0V" RESC1608N 3135.83,3409.45 r270 top
R54 "ERJ-3EKF22R0V" RESC1608N 3204.72,3407.48 r270 top
R55 "ERJ-3EKF22R0V" RESC1608N 3177.17,2981.3 r90 top
R56 "ERJ-3EKF22R0V" RESC1608N 3248.03,2982.28 r90 top
R57 "ERJ-3EKF22R0V" RESC1608N 3316.93,2982.28 r90 top
R58 "RN731JTTD1001F25" RESC1608N 3274.61,3407.48 r270 top
R59 "RN731JTTD1001F25" RESC1608N 3361.22,4681.1 r270 top
R60 "RN731JTTD1002F25" RESC1608N 3072.83,4632.87 r0 top
R61 "ERJ-3EKF22R0V" RESC1608N 3098.43,3866.14 r90 top
R62 "ERJ-3EKF22R0V" RESC1608N 3025.59,3868.11 r90 top
R63 "ERJ-3EKF22R0V" RESC1608N 3390.75,3866.14 r90 top
R64 "ERJ-3EKF22R0V" RESC1608N 3316.93,3865.16 r90 top
R65 "ERJ-3EKF22R0V" RESC1608N 3245.08,3865.16 r90 top
R66 "ERJ-3EKF22R0V" RESC1608N 3170.28,3866.14 r90 top
R67 "RN731JTTD1001F25" RESC1608N 4709.65,4710.63 r270 top
R68 "RN731JTTD1002F25" RESC1608N 4422.24,4642.72 r0 top
R69 "RN731JTTD1001F25" RESC1608N 3959.65,4690.94 r270 top
R70 "CPF0603B10KE" RESC1608N 4129.92,3554.13 r90 top
R74 "ERJ-3EKF22R0V" RESC1608N 3877.95,2968.5 r90 top
R75 "ERJ-3EKF22R0V" RESC1608N 3808.07,2967.52 r90 top
R76 "ERJ-3EKF22R0V" RESC1608N 3703.74,3218.5 r180 top
R77 "ERJ-3EKF22R0V" RESC1608N 3701.77,3151.57 r180 top
R78 "ERJ-3EKF22R0V" RESC1608N 4022.64,2967.52 r90 top
R79 "RMCF0603ZT0R00" RESC1608N 4326.77,3232.28 r0 top
R80 "ERJ-3EKF22R0V" RESC1608N 3950.79,2968.5 r90 top
R81 "ERJ-3EKF1202V" RESC1608N 3943.9,3515.75 r90 bottom
R82 "ERJ-3EKF22R0V" RESC1608N 4162.4,2968.5 r90 top
R83 "TNPW0603100KBEA" RESC1608N 3900.59,3555.12 r270 top
R84 "ERJ-3EKF22R0V" RESC1608N 4092.52,2968.5 r90 top
R85 "" RESC1608N 3557.08,3448.82 r270 top
R86 "ERJ-3EKF22R0V" RESC1608N 4303.15,2967.52 r90 top
R87 "ERJ-3EKF22R0V" RESC1608N 4234.25,2967.52 r90 top
R88 "TNPW0603100KBEA" RESC1608N 3814.96,3414.37 r180 bottom
R89 "CPF0603B10KE" RESC1608N 4256.89,3527.56 r0 top
R90 "CPF0603B10KE" RESC1608N 4420.28,3667.32 r180 top
R91 "Resistor" RESC1608N 201.77,3277.56 r90 top
R92 "Resistor" RESC1608N 270.67,3277.56 r90 top
R93 "Resistor" RESC1608N 339.57,3278.54 r90 top
R94 "Resistor" RESC1608N 1117.13,2863.19 r180 top
R95 "Resistor" RESC1608N 1117.13,2931.1 r0 top
R96 "Resistor" RESC1608N 1988.19,2295.28 r270 top
R97 "Resistor" RESC1608N 5201.77,464.57 r0 top
R98 "Resistor" RESC1608N 2125,2293.31 r270 top
R99 "Resistor" RESC1608N 2280.51,2290.35 r270 top
R100 "Resistor" RESC1608N 2428.15,2288.39 r270 top
R101 "RN731JTTD1001F25" RESC1608N 5138.78,4070.87 r90 top
R102 "RMCF0603ZT0R00" RESC1608N 4962.6,2920.28 r270 top
R103 "Resistor" RESC1608N 5553.15,4408.46 r0 top
R104 "Resistor" RESC1608N 5555.12,4337.6 r180 top
R105 "Resistor" RESC1608N 5068.9,4479.33 r90 top
R106 "Resistor" RESC1608N 5139.76,4480.32 r270 top
R107 "" RESC1608N 2352.73,1200.42 r135 top
R108 "" RESC1608N 2250.41,1251.64 r225 top
R109 "" RESC1608N 2201.2,1301.84 r225 top
R110 "" RESC1608N 2102.77,1399.28 r225 top
R111 "" RESC1608N 2151.98,1349.08 r225 top
R112 "RN731JTTD1003F100" RESC1608N 1485.6,1385.46 r135 bottom
R113 "Resistor" RESC1608N 1554.13,167.32 r270 bottom
R114 "Resistor" RESC1608N 1975.39,164.37 r270 bottom
R115 "Resistor" RESC1608N 2183.07,379.92 r180 bottom
R116 "Resistor" RESC1608N 2588.58,95.47 r180 bottom
R117 "RN731JTTD1002F25" RESC1608N 1503.32,1138.41 r225 top
R118 "RN731JTTD1003F100" RESC1608N 1460.01,1577.39 r45 top
R119 "RN73H1JTTD1202F100" RESC1608N 1857.65,1659.08 r225 bottom
R120 "RN73H1JTTD1202F100" RESC1608N 1992.49,1507.51 r225 bottom
R121 "" RESC1608N 3412.4,1313.98 r225 top
R122 "" RESC1608N 3311.97,1315.9 r225 top
R123 "" RESC1608N 3263.78,1365.16 r225 top
R124 "" RESC1608N 3165.4,1465.59 r225 top
R125 "" RESC1608N 3214.57,1414.37 r225 top
R126 "RN731JTTD1003F100" RESC1608N 2490.16,1442.91 r135 bottom
R127 "Resistor" RESC1608N 1204.72,920.28 r0 top
R128 "RN731JTTD1002F25" RESC1608N 2558.07,1194.88 r225 top
R129 "RN731JTTD1003F100" RESC1608N 2539.37,1679.13 r45 top
R130 "Resistor" RESC1608N 1062.01,163.39 r270 bottom
R131 "Resistor" RESC1608N 538.39,201.77 r180 bottom
R132 "RN73H1JTTD1202F100" RESC1608N 2688.98,1646.65 r315 bottom
R133 "RN73H1JTTD1202F100" RESC1608N 3106.3,1513.78 r225 bottom
S1 "SPST-ON" 118250272 5145.19,154.8 r0 top locked
TP1 "Test Point" TP 1923.23,4432.09 r90 bottom
TP2 "Test Point" TP 1906.5,4576.77 r180 bottom
TP3 "Test Point" TP 1890.75,4728.35 r90 bottom
TP5 "Test Point" TP 1326.77,4638.78 r90 bottom
TP6 "Test Point" TP 1907.57,2574.05 r90 top
TP7 "Test Point" TP 1997.14,2466.76 r90 top
TP8 "Test Point" TP 345.47,3127.95 r180 bottom
TP9 "Test Point" TP 2297.24,2543.31 r90 top
TP10 "Test Point" TP 2375.98,2433.07 r90 top
TP11 "Test Point" TP 488.19,3274.61 r180 bottom
TP12 "Test Point" TP 1465.55,4709.65 r90 bottom
TP13 "Test Point" TP 1286.63,4780.83 r0 bottom
TP14 "Test Point" TP 1482.28,2519.69 r180 top
TP15 "Test Point" TP 1564.96,2403.54 r90 top
TP17 "Test Point" TP 3284.45,1060.04 r90 top
TP18 "Test Point" TP 3877.34,2036.05 r45 top
TP19 "Test Point" TP 3197.83,776.57 r90 top
TP20 "Test Point" TP 3146.65,958.66 r90 top
TP21 "Test Point" TP 3915.35,1108.27 r90 top
TP22 "Test Point" TP 4186.39,2061.64 r135 bottom
TP23 "Test Point" TP 3816.93,763.78 r90 top
TP24 "Test Point" TP 3797.24,937.99 r90 top
TP26 "Test Point" TP 3433.07,4785.43 r90 top
TP27 "Test Point" TP 4788.39,4818.9 r90 top
TP29 "Test Point" TP 4034.45,4799.21 r180 top
TP30 "Test Point" TP 3728.35,4635.83 r90 top
TP37 "Test Point" TP 458.66,3927.17 r270 top
TP38 "Test Point" TP 542.32,3929.13 r270 top
TP39 "Test Point" TP 1560.03,2967.51 r180 top
TP40 "Test Point" TP 1630.89,2807.08 r90 top
TP41 "Test Point" TP 1012.8,2861.22 r90 top
TP43 "Test Point" TP 5340.55,4151.57 r90 top
TP44 "Test Point" TP 5388.78,4066.93 r90 top
TP45 "Test Point" TP 5468.5,4147.64 r90 top
TP46 "Test Point" TP 5542.32,4065.94 r90 top
TP47 "Test Point" TP 5849.41,4069.88 r90 top
TP48 "Test Point" TP 5352.36,2954.72 r90 top
TP49 "Test Point" TP 5930.12,4158.46 r90 top
TP50 "Test Point" TP 4788.39,3550.2 r90 top
TP51 "Test Point" TP 4787.4,3625.98 r90 top
TP52 "Test Point" TP 4787.4,3708.66 r90 top
TP53 "Test Point" TP 4981.3,4070.87 r90 top
TP54 "Test Point" TP 5221.46,4067.91 r90 top
TP55 "Test Point" TP 5626.97,4149.61 r90 top
TP56 "Test Point" TP 5690.94,4073.82 r90 top
TP57 "Test Point" TP 5774.61,4154.53 r90 top
TP58 "Test Point" TP 5664.37,4408.46 r270 top
TP59 "Test Point" TP 5371.06,4322.83 r270 top
TP60 "Test Point" TP 5065.94,4586.61 r0 top
TP61 "Test Point" TP 5167.32,4264.76 r0 top
TP62 "Test Point" TP 707.68,2719.49 r0 top
TP63 "Test Point" TP 708.66,2633.86 r0 top
TP64 "Test Point" TP 708.66,2534.45 r0 top
TP65 "Test Point" TP 5770.3,2251.24 r90 top
TP66 "Test Point" TP 5899.61,829.72 r90 top
TP67 "Test Point" TP 4841.54,1279.53 r90 top
TP68 "Test Point" TP 4597.44,970.47 r90 top
TP69 "Test Point" TP 4599.41,891.73 r90 top
U1 "LMR33640DDDAR" SOIC127P600X170-9N 5582.78,2035.29 r180 top
U2 "LMR33640DDDAR" SOIC127P600X170-9N 5606.77,1378.74 r180 top
U3 "TLV1117LV33DCYR" SOT-223-4-2 5148.62,964.57 r0 top
U4 "" CM4 1744.85,3907.32 r90 top locked
U5 "SN74LVC2G07DCKT" SOT65P210X1106N 2035.43,2551.18 r0 top
U6 "SN74LVC2G07DCKT" SOT65P210X1106N 2412.4,2520.67 r0 top
U7 "SN74LVC2G07DCKT" SOT65P210X1106N 1601.38,2494.09 r0 top
U8 "93C46B-I/SN" SOIC127P600X175-8N-2 3747.41,2480.93 r135 top
U9 "FT2232HL-REEL" LQFP-64 4312.37,2025.63 r45 top
U10 "SN75176ADR" SOIC127P600X175-8N-2 3390.75,906.5 r0 top
U11 "SN75176ADR" SOIC127P600X175-8N-2 4019.68,903.54 r0 top
U12 "MAX4996LETG+ / MAX4996LETG+" TQFN-24 3202.76,3191.93 r90 top
U13 "TPS22919DCKR" SC70-TPS22919DCKR6 3230.32,4674.21 r0 top
U14 "TPS22919DCKR" SC70-TPS22919DCKR6 4595.47,4706.69 r0 top
U15 "74LVC1G07SE-7" SOT-353 4392.72,4754.92 r0 top
U16 "TPS22919DCKR" SC70-TPS22919DCKR6 3844.49,4685.04 r0 top
U17 "USB2514B/M2" SQFN-36 4052.17,3302.17 r90 top
U18 "AT24C04D-XHM-B" TSSOP-8AT24C04D-XHM-B 4501.97,3565.94 r180 top
U19 "PIC16F18857" SOP65P780X200-28N 402.56,3608.27 r90 top
U20 "SN74LVC2G07DCKT" SOT65P210X1106N 1515.75,2884.84 r0 top
U21 "LARA-R6001D-00B" LARA-R6 5827.76,3769.69 r0 top
U22 "MCP7940NT-E/MS" SOP65P490X110-8N 511.81,2622.05 r0 top
U23 "LAN9500A-ABZJ-TR" QFN50P800X800X100-57N-D 1780.88,1282.11 r225 top
U24 "TPD4EUSB30DQAR" USON-10 1904.13,437.99 r0 bottom
U25 "TPD4EUSB30DQAR" USON-10 2472.5,431.79 r0 bottom
U26 "TPD4EUSB30DQAR" USON-10 1027.56,483.66 r270 bottom
U27 "TPD4EUSB30DQAR" USON-10 832.68,481.69 r270 bottom
U28 "LAN9500A-ABZJ-TR" QFN50P800X800X100-57N-D 2822.83,1346.46 r225 top
U29 "DF10M" 621-DF10M 5544.29,672.24 r270 top
Y1 "NX3225SA-12MHZ-STD-CSR-6" NX3225SA 3913.67,1813.13 r225 top
Y2 "FL2400155" FL2400155 3706.69,3448.82 r90 top
Y3 "XT1312HHRXX32K76E" XT1312HHRXX32K76E 286.42,2631.89 r270 top
Y4 "DSC1001CE5-025.0000T" DSC6183CI2A032K768 1539.74,1491.76 r45 top
Y5 "DSC1001CE5-025.0000T" DSC6183CI2A032K768 2612.2,1600.39 r45 top

## Footprints (in the part's own frame and the unit in brackets; to place one, negate y for a bottom-side part, rotate by r counter-clockwise, add the part's x,y. Pads: shape width x height; smd on the part's side, far side on the other; paste and mask are expansions set on the pad)
1.5uH-XAL4020 [mm]
  rect 0.98x3.4 smd: 1(-1.185,0) 2(1.185,0)
  silkscreen extent -2.34,-2.3 2.36,2.4, body extent -2.2,-2.15 2.1,2.15
621-DF10M [mm]
  rect 1.16x1.16 / inner round 1.16 / far side rect 1.16x1.16 hole 0.76: 1(-4.125,2.55)
  round 1.16 hole 0.76: 2(-4.125,-2.55) 3(4.125,-2.55) 4(4.125,2.55)
  silkscreen extent -4.7,-4.25 3.25,4.25, body extent -4.17,-4.18 4.37,4.18, height 4.63
7966442 [mm]
  round 2.25 hole 1.5: 1(0,0) 2(5,0)
  silkscreen extent -3.5,-10 8.5,2, body extent -3.5,-10 8.5,2, height 8.5
13220312 [mm]
  round 2.55 hole 1.7: 1(0,0) 2(5.08,0) 3(5.08,5.08) 4(0,5.08)
  round 2.25 hole 1.5: 5(2.54,2.54)
  silkscreen extent -1.46,-1.46 6.54,6.54, body extent -1.46,-2.55 22.04,7.63, height 11.61
23365821 [mm]
  rect 0.8x1.14 smd: C1(0.25,6.98) C2(-2.29,6.98) C3(-4.83,6.98) C5(1.52,6.98) C6(-1.02,6.98) C7(-3.56,6.98) CD1(2.47,6.98)
  round 0.375 hole 0.75 unplated: MH1(3.5,-5.25) MH2(-5,-5.25)
  rect 0.7x2.1 smd: MP1(6.5,5.5) MP2(-6.5,5.5) MP3(-6.5,-6.5) MP4(6.5,-6.5)
  silkscreen extent -6.15,-7.25 6.15,8.1, body extent -6.59,-7.29 6.5,7.29, height 1.34
118250272 [mm]
  round 1.515 hole 1.01: 1(0,0) 2(4.5,0)
  round 1.98 hole 1.32: MH1(-1.255,2.49) MH2(5.755,2.49)
  silkscreen extent -1.8,-0.05 -1.7,0.05, body extent -2,-8.35 6.41,4.01, height 7.26
3404242122 [mm]
  rect 3x4.75 smd: 1(-4.25,0) 2(4.25,0)
  body extent -5.71,-2.02 5.59,2.18, height 4.12
61900311121 [mm]
  rect 1.95x1.95 / inner round 1.95 / far side rect 1.95x1.95 hole 1.3: 1(0,0)
  round 1.95 hole 1.3: 2(-2.54,0) 3(-5.08,0)
  silkscreen extent -6.65,-2.85 1.27,3.1, body extent -6.5,-2.7 1.12,3.1, height 11.75
691322310003 [mm]
  rect 2.025x2.025 / inner round 2.025 / far side rect 2.025x2.025 hole 1.35: 1(0,0)
  round 2.025 hole 1.35: 2(3.81,0) 3(7.62,0)
  silkscreen extent -2.5,-1.2 10.12,8, body extent -2.5,-1.1 10.12,8.1, height 7.4
BEADC0603X33N [mm]
  rect 0.55x0.4 smd: 1(-0.45,0) 2(0.45,0)
  body extent -0.3,-0.15 0.3,0.15, height 0.33
BLM18SP221SN1B [mm]
  rect 0.65x0.7 smd: 1(-0.675,0) 2(0.675,0)
  body extent -0.8,-0.38 0.8,0.42, height 0.81
CAPC402 [mm]
  rect 0.36x0.33 smd: 1(-0.28,0) 2(0.28,0)
  body extent -0.2,-0.1 0.2,0.1, height 0.22
CAPC1210 [mm]
  rect 1.48x2.82 smd: 1(-1.32,0) 2(1.32,0)
  silkscreen extent 0,-1.15 0,1.15, body extent -1.65,-1.25 1.65,1.25, height 2.8
CAPC1608N [mm]
  rect 1x1 smd: 1(-0.8,0) 2(0.8,0)
  body extent -1.03,-0.52 1.07,0.51, height 0.81
CDSOD323T12LC [mil]
  rect 31.5x31.5 smd: 1(-43.31,0) 2(43.31,0)
  body extent -56,-26 56,26, height 49
CM4 [mm]
  rect 0.7x0.2 smd: 1(18.5,-7.3) 2(15.42,-7.3) 3(18.5,-6.9) 4(15.42,-6.9) 5(18.5,-6.5) 6(15.42,-6.5) 7(18.5,-6.1) 8(15.42,-6.1) 9(18.5,-5.7) 10(15.42,-5.7) 11(18.5,-5.3) 12(15.42,-5.3) 13(18.5,-4.9) 14(15.42,-4.9) 15(18.5,-4.5) 16(15.42,-4.5) 17(18.5,-4.1) 18(15.42,-4.1) 19(18.5,-3.7) 20(15.42,-3.7) 21(18.5,-3.3) 22(15.42,-3.3) 23(18.5,-2.9) 24(15.42,-2.9) 25(18.5,-2.5) 26(15.42,-2.5) 27(18.5,-2.1) 28(15.42,-2.1) 29(18.5,-1.7) 30(15.42,-1.7) 31(18.5,-1.3) 32(15.42,-1.3) 33(18.5,-0.9) 34(15.42,-0.9) 35(18.5,-0.5) 36(15.42,-0.5) 37(18.5,-0.1) 38(15.42,-0.1) 39(18.5,0.3) 40(15.42,0.3) 41(18.5,0.7) 42(15.42,0.7) 43(18.5,1.1) 44(15.42,1.1) 45(18.5,1.5) 46(15.42,1.5) 47(18.5,1.9) 48(15.42,1.9) 49(18.5,2.3) 50(15.42,2.3) 51(18.5,2.7) 52(15.42,2.7) 53(18.5,3.1) 54(15.42,3.1) 55(18.5,3.5) 56(15.42,3.5) 57(18.5,3.9) 58(15.42,3.9) 59(18.5,4.3) 60(15.42,4.3) 61(18.5,4.7) 62(15.42,4.7) 63(18.5,5.1) 64(15.42,5.1) 65(18.5,5.5) 66(15.42,5.5) 67(18.5,5.9) 68(15.42,5.9) 69(18.5,6.3) 70(15.42,6.3) 71(18.5,6.7) 72(15.42,6.7) 73(18.5,7.1) 74(15.42,7.1) 75(18.5,7.5) 76(15.42,7.5) 77(18.5,7.9) 78(15.42,7.9) 79(18.5,8.3) 80(15.42,8.3) 81(18.5,8.7) 82(15.42,8.7) 83(18.5,9.1) 84(15.42,9.1) 85(18.5,9.5) 86(15.42,9.5) 87(18.5,9.9) 88(15.42,9.9) 89(18.5,10.3) 90(15.42,10.3) 91(18.5,10.7) 92(15.42,10.7) 93(18.5,11.1) 94(15.42,11.1) 95(18.5,11.5) 96(15.42,11.5) 97(18.5,11.9) 98(15.42,11.9) 99(18.5,12.3) 100(15.42,12.3) 101(-15.42,-7.3) 102(-18.5,-7.3) 103(-15.42,-6.9) 104(-18.5,-6.9) 105(-15.42,-6.5) 106(-18.5,-6.5) 107(-15.42,-6.1) 108(-18.5,-6.1) 109(-15.42,-5.7) 110(-18.5,-5.7) 111(-15.42,-5.3) 112(-18.5,-5.3) 113(-15.42,-4.9) 114(-18.5,-4.9) 115(-15.42,-4.5) 116(-18.5,-4.5) 117(-15.42,-4.1) 118(-18.5,-4.1) 119(-15.42,-3.7) 120(-18.5,-3.7) 121(-15.42,-3.3) 122(-18.5,-3.3) 123(-15.42,-2.9) 124(-18.5,-2.9) 125(-15.42,-2.5) 126(-18.5,-2.5) 127(-15.42,-2.1) 128(-18.5,-2.1) 129(-15.42,-1.7) 130(-18.5,-1.7) 131(-15.42,-1.3) 132(-18.5,-1.3) 133(-15.42,-0.9) 134(-18.5,-0.9) 135(-15.42,-0.5) 136(-18.5,-0.5) 137(-15.42,-0.1) 138(-18.5,-0.1) 139(-15.42,0.3) 140(-18.5,0.3) 141(-15.42,0.7) 142(-18.5,0.7) 143(-15.42,1.1) 144(-18.5,1.1) 145(-15.42,1.5) 146(-18.5,1.5) 147(-15.42,1.9) 148(-18.5,1.9) 149(-15.42,2.3) 150(-18.5,2.3) 151(-15.42,2.7) 152(-18.5,2.7) 153(-15.42,3.1) 154(-18.5,3.1) 155(-15.42,3.5) 156(-18.5,3.5) 157(-15.42,3.9) 158(-18.5,3.9) 159(-15.42,4.3) 160(-18.5,4.3) 161(-15.42,4.7) 162(-18.5,4.7) 163(-15.42,5.1) 164(-18.5,5.1) 165(-15.42,5.5) 166(-18.5,5.5) 167(-15.42,5.9) 168(-18.5,5.9) 169(-15.42,6.3) 170(-18.5,6.3) 171(-15.42,6.7) 172(-18.5,6.7) 173(-15.42,7.1) 174(-18.5,7.1) 175(-15.42,7.5) 176(-18.5,7.5) 177(-15.42,7.9) 178(-18.5,7.9) 179(-15.42,8.3) 180(-18.5,8.3) 181(-15.42,8.7) 182(-18.5,8.7) 183(-15.42,9.1) 184(-18.5,9.1) 185(-15.42,9.5) 186(-18.5,9.5) 187(-15.42,9.9) 188(-18.5,9.9) 189(-15.42,10.3) 190(-18.5,10.3) 191(-15.42,10.7) 192(-18.5,10.7) 193(-15.42,11.1) 194(-18.5,11.1) 195(-15.42,11.5) 196(-18.5,11.5) 197(-15.42,11.9) 198(-18.5,11.9) 199(-15.42,12.3) 200(-18.5,12.3)
  round 2.7 hole 2.7 paste-2539.97 mask+1.7: MH(-16.5,24) MH(-16.5,-24) MH(16.5,24) MH(16.5,-24)
  silkscreen extent -20,-27.5 20,27.5, body extent -19.95,-27.5 20.05,27.5, height 6.65
DSC6183CI2A032K768 [mm]
  rect 1x0.9 smd: 1(-0.95,1.05) 2(-0.95,-1.05) 3(0.95,-1.05) 4(0.95,1.05)
  silkscreen extent -1.69,-1.6 1.25,1.6, body extent -1.36,-1.6 1.36,1.6, height 1
FIDUCIAL-1MM [mm] "1MM FIDUCAL MARKER"
  round 1 smd paste-1 mask+0.5: FID(0,0)
  Signal 1 pour cut-out: -1.5,0 -1.386,-0.574 -1.061,-1.061 -0.574,-1.386 0,-1.5 0,-1.5 0.574,-1.386 1.061,-1.061 1.386,-0.574 1.5,0 1.5,0 1.386,0.574 1.061,1.061 0.574,1.386 0,1.5 0,1.5 -0.574,1.386 -1.061,1.061 -1.386,0.574 -1.5,0
FL2400155 [mil]
  rect 59.06x47.24 smd: 1(-41.34,-31.5) 2(41.34,-31.5) 3(41.34,31.5) 4(-41.34,31.5)
  body extent -66,-50 66,50, height 35
HDRV6W64P0X254 [mm]
  rect 1.65x1.65 / inner round 1.65 / far side rect 1.65x1.65 hole 1.1: 1(0,0)
  round 1.65 hole 1.1: 2(2.54,0) 3(5.08,0) 4(7.62,0) 5(10.16,0) 6(12.7,0)
  silkscreen extent -1.42,-1.34 14.12,1.34, body extent -1.27,-1.35 13.97,1.19, height 8.69
LARA-R6 [mm] "Footprint for LARA modules"
  rect 0.8x1.5 smd paste-2539.97: 1(0,0) 2(-1.1,0) 3(-2.2,0) 4(-3.3,0) 5(-4.4,0) 6(-5.5,0) 7(-6.6,0) 8(-7.7,0) 9(-8.8,0) 10(-9.9,0) 11(-11,0) 12(-12.1,0) 13(-13.2,0) 14(-14.3,0) 15(-15.4,0) 16(-16.5,0) 17(-17.6,0) 18(-18.7,0) 19(-19.8,0) 20(-20.9,0) 21(-22,0) 33(-22,-13.9) 34(-20.9,-13.9) 35(-19.8,-13.9) 36(-18.7,-13.9) 37(-17.6,-13.9) 38(-16.5,-13.9) 39(-15.4,-13.9) 40(-14.3,-13.9) 41(-13.2,-13.9) 42(-12.1,-13.9) 43(-11,-13.9) 44(-9.9,-13.9) 45(-8.8,-13.9) 46(-7.7,-13.9) 47(-6.6,-13.9) 48(-5.5,-13.9) 49(-4.4,-13.9) 50(-3.3,-13.9) 51(-2.2,-13.9) 52(-1.1,-13.9) 53(0,-13.9)
  rect 1.5x0.8 smd paste-2539.97: 22(-22.95,-1.45) 23(-22.95,-2.55) 24(-22.95,-3.65) 25(-22.95,-4.75) 26(-22.95,-5.85) 27(-22.95,-6.95) 28(-22.95,-8.05) 29(-22.95,-9.15) 30(-22.95,-10.25) 31(-22.95,-11.35) 32(-22.95,-12.45) 54(0.95,-12.45) 55(0.95,-11.35) 56(0.95,-10.25) 57(0.95,-9.15) 58(0.95,-8.05) 59(0.95,-6.95) 60(0.95,-5.85) 61(0.95,-4.75) 62(0.95,-3.65) 63(0.95,-2.55) 64(0.95,-1.45)
  rect 1.1x1.1 smd paste-0.025: 65(-0.75,-1.7) 66(-0.75,-3.8) 67(-0.75,-5.9) 68(-0.75,-8) 69(-0.75,-10.1) 70(-0.75,-12.2) 71(-2.55,-1.7) 72(-2.55,-3.8) 73(-2.55,-5.9) 74(-2.55,-8) 75(-2.55,-10.1) 76(-2.55,-12.2) 77(-4.35,-1.7) 78(-4.35,-12.2) 79(-7.95,-1.7) 80(-7.95,-12.2) 81(-14.05,-1.7) 82(-14.05,-12.2) 83(-17.65,-1.7) 84(-17.65,-12.2) 85(-19.45,-1.7) 86(-19.45,-3.8) 87(-19.45,-5.9) 88(-19.45,-8) 89(-19.45,-10.1) 90(-19.45,-12.2) 91(-21.25,-1.7) 92(-21.25,-3.8) 93(-21.25,-5.9) 94(-21.25,-8) 95(-21.25,-10.1) 96(-21.25,-12.2) 97(-4.35,-5.9) 98(-4.35,-8) 99(-17.65,-5.9) 100(-17.65,-8)
  silkscreen extent -24,-18.95 2.77,5.05, body extent -24.03,-18.95 1.97,5.05, height 2.63
LED0603 [mm]
  rect 0.95x0.95 smd: 1(-0.75,0) 2(0.75,0)
  silkscreen extent -1.67,-0.93 0,0.92, body extent -1.07,-0.62 0.93,0.63, height 0.7
LQFP-64 [mm]
  rect 1x0.22 smd: 1(-5.575,3.75) 2(-5.575,3.25) 3(-5.575,2.75) 4(-5.575,2.25) 5(-5.575,1.75) 6(-5.575,1.25) 7(-5.575,0.75) 8(-5.575,0.25) 9(-5.575,-0.25) 10(-5.575,-0.75) 11(-5.575,-1.25) 12(-5.575,-1.75) 13(-5.575,-2.25) 14(-5.575,-2.75) 15(-5.575,-3.25) 16(-5.575,-3.75) 33(5.575,-3.75) 34(5.575,-3.25) 35(5.575,-2.75) 36(5.575,-2.25) 37(5.575,-1.75) 38(5.575,-1.25) 39(5.575,-0.75) 40(5.575,-0.25) 41(5.575,0.25) 42(5.575,0.75) 43(5.575,1.25) 44(5.575,1.75) 45(5.575,2.25) 46(5.575,2.75) 47(5.575,3.25) 48(5.575,3.75)
  rect 0.22x1 smd: 17(-3.75,-5.575) 18(-3.25,-5.575) 19(-2.75,-5.575) 20(-2.25,-5.575) 21(-1.75,-5.575) 22(-1.25,-5.575) 23(-0.75,-5.575) 24(-0.25,-5.575) 25(0.25,-5.575) 26(0.75,-5.575) 27(1.25,-5.575) 28(1.75,-5.575) 29(2.25,-5.575) 30(2.75,-5.575) 31(3.25,-5.575) 32(3.75,-5.575) 49(3.75,5.575) 50(3.25,5.575) 51(2.75,5.575) 52(2.25,5.575) 53(1.75,5.575) 54(1.25,5.575) 55(0.75,5.575) 56(0.25,5.575) 57(-0.25,5.575) 58(-0.75,5.575) 59(-1.25,5.575) 60(-1.75,5.575) 61(-2.25,5.575) 62(-2.75,5.575) 63(-3.25,5.575) 64(-3.75,5.575)
  silkscreen extent -6,-6 6,6, body extent -6,-6 6,6, height 1.6
MH-2 [mm]
  round 2.7 hole 2.7 paste-2539.97 mask+1.7: MH(0,0)
MOLEX-SD-47219 [mm]
  rect 0.8x1.5 smd paste-0.1 mask+0.07: 1(3.205,-1.55) 2(2.105,-1.55) 3(1.005,-1.55) 4(-0.095,-1.55) 5(-1.195,-1.55) 6(-2.295,-1.55) 7(-3.395,-1.55) 8(-4.495,-1.55)
  rect 1.45x2 smd paste-0.1 mask+0.07: G1(6.875,-4.15) G2(6.875,4.15) G3(-6.875,4.15) G4(-6.875,-4.15)
  silkscreen extent -7.27,-6.75 7.33,7.75, body extent -7.28,-6.75 7.32,7.75, height 2.06
NX3225SA [mm]
  rect 1.4x1.2 smd: 1(-1.1,-0.8) 2(1.1,-0.8) 3(1.1,0.8) 4(-1.1,0.8)
  silkscreen extent -1.3,-1.85 -1.2,-1.75, body extent -1.6,-1.25 1.6,1.25, height 0.7
OLED128x32 [mm]
  round 1.98 hole 1.32: 1(0,0) 2(2.54,0) 3(5.08,0) 4(7.62,0)
  silkscreen extent -2.26,-4.5 9.96,4.7, body extent -1.08,-1.46 9.08,1.58, height 5.08